# Altium PCB PCI Express Mini L1_V2.PCBDOC (part 1 of 9)
Units mm, origin at the board's own origin, x right, y up, seen from the top; angles counter-clockwise.
Board outline 70 x 83.2 mm, 6 copper layers (TopLayer, Layer 1, Layer 2, Layer 3, Layer 4, Bottom Layer), stack 0.893 mm thick; 442 components, 259 nets, 1412 pads, 870 vias.
Unrouted connection lines stored in the file: 2.
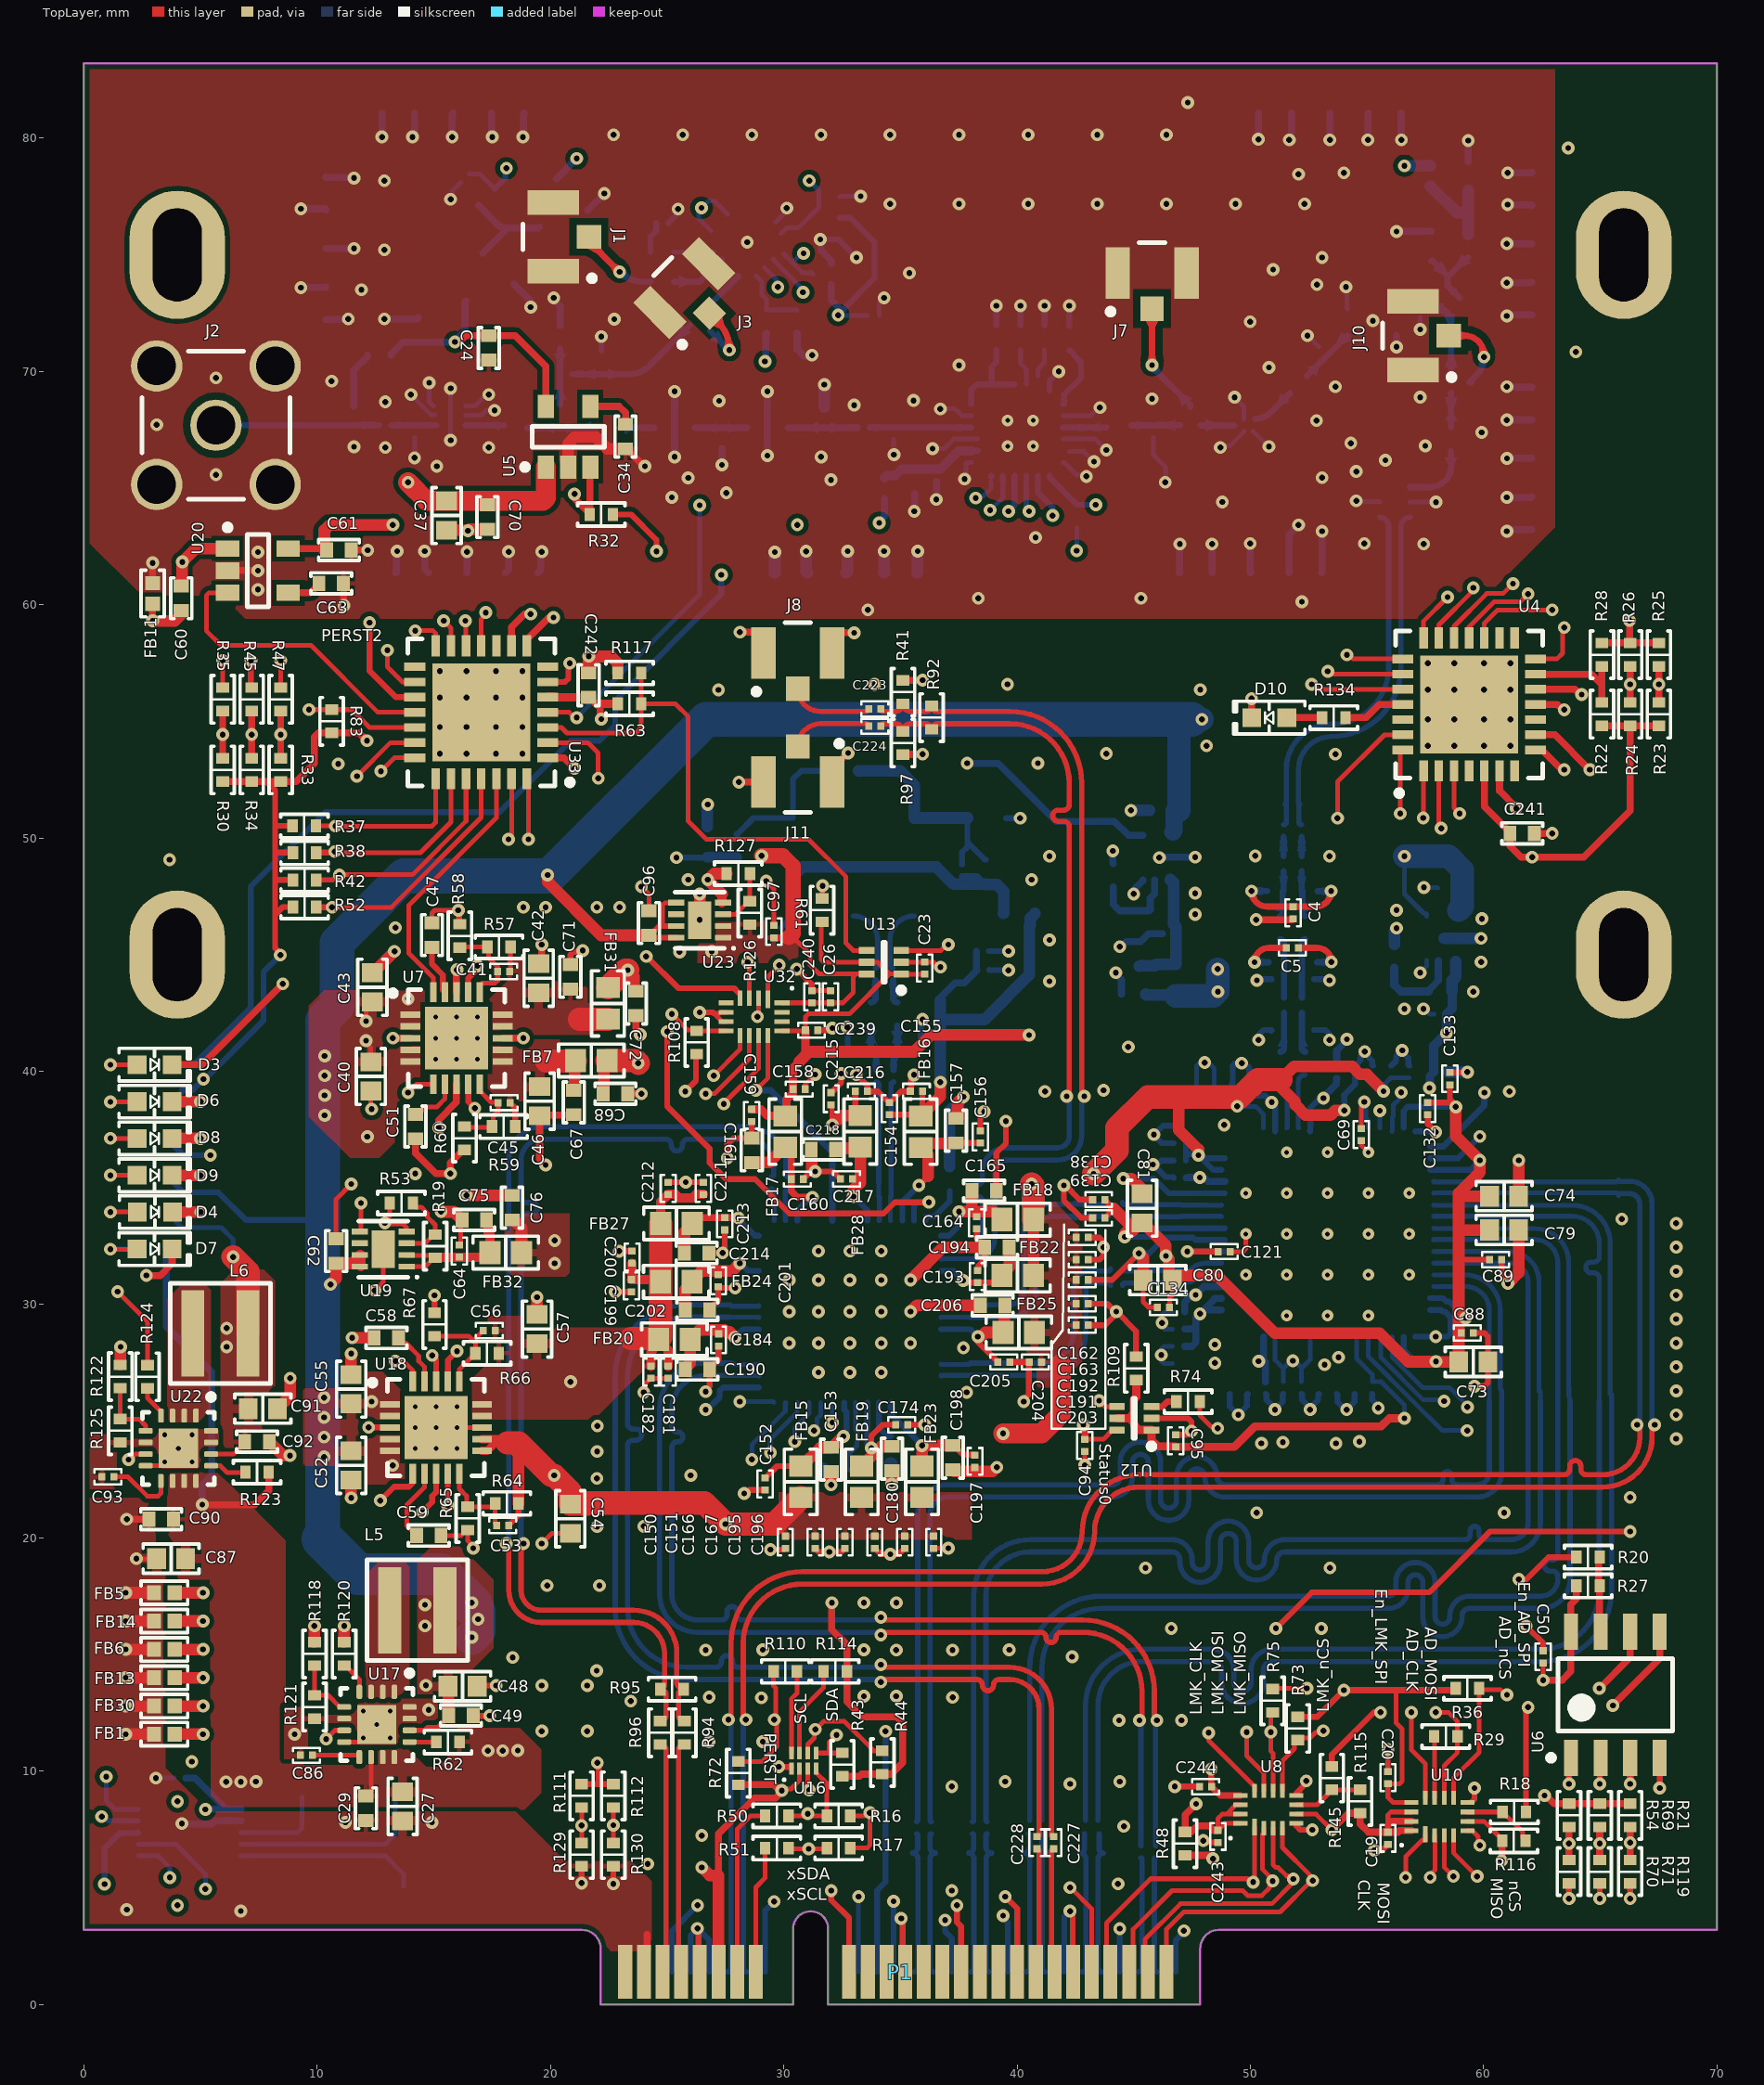
[diagram p0: TopLayer view]
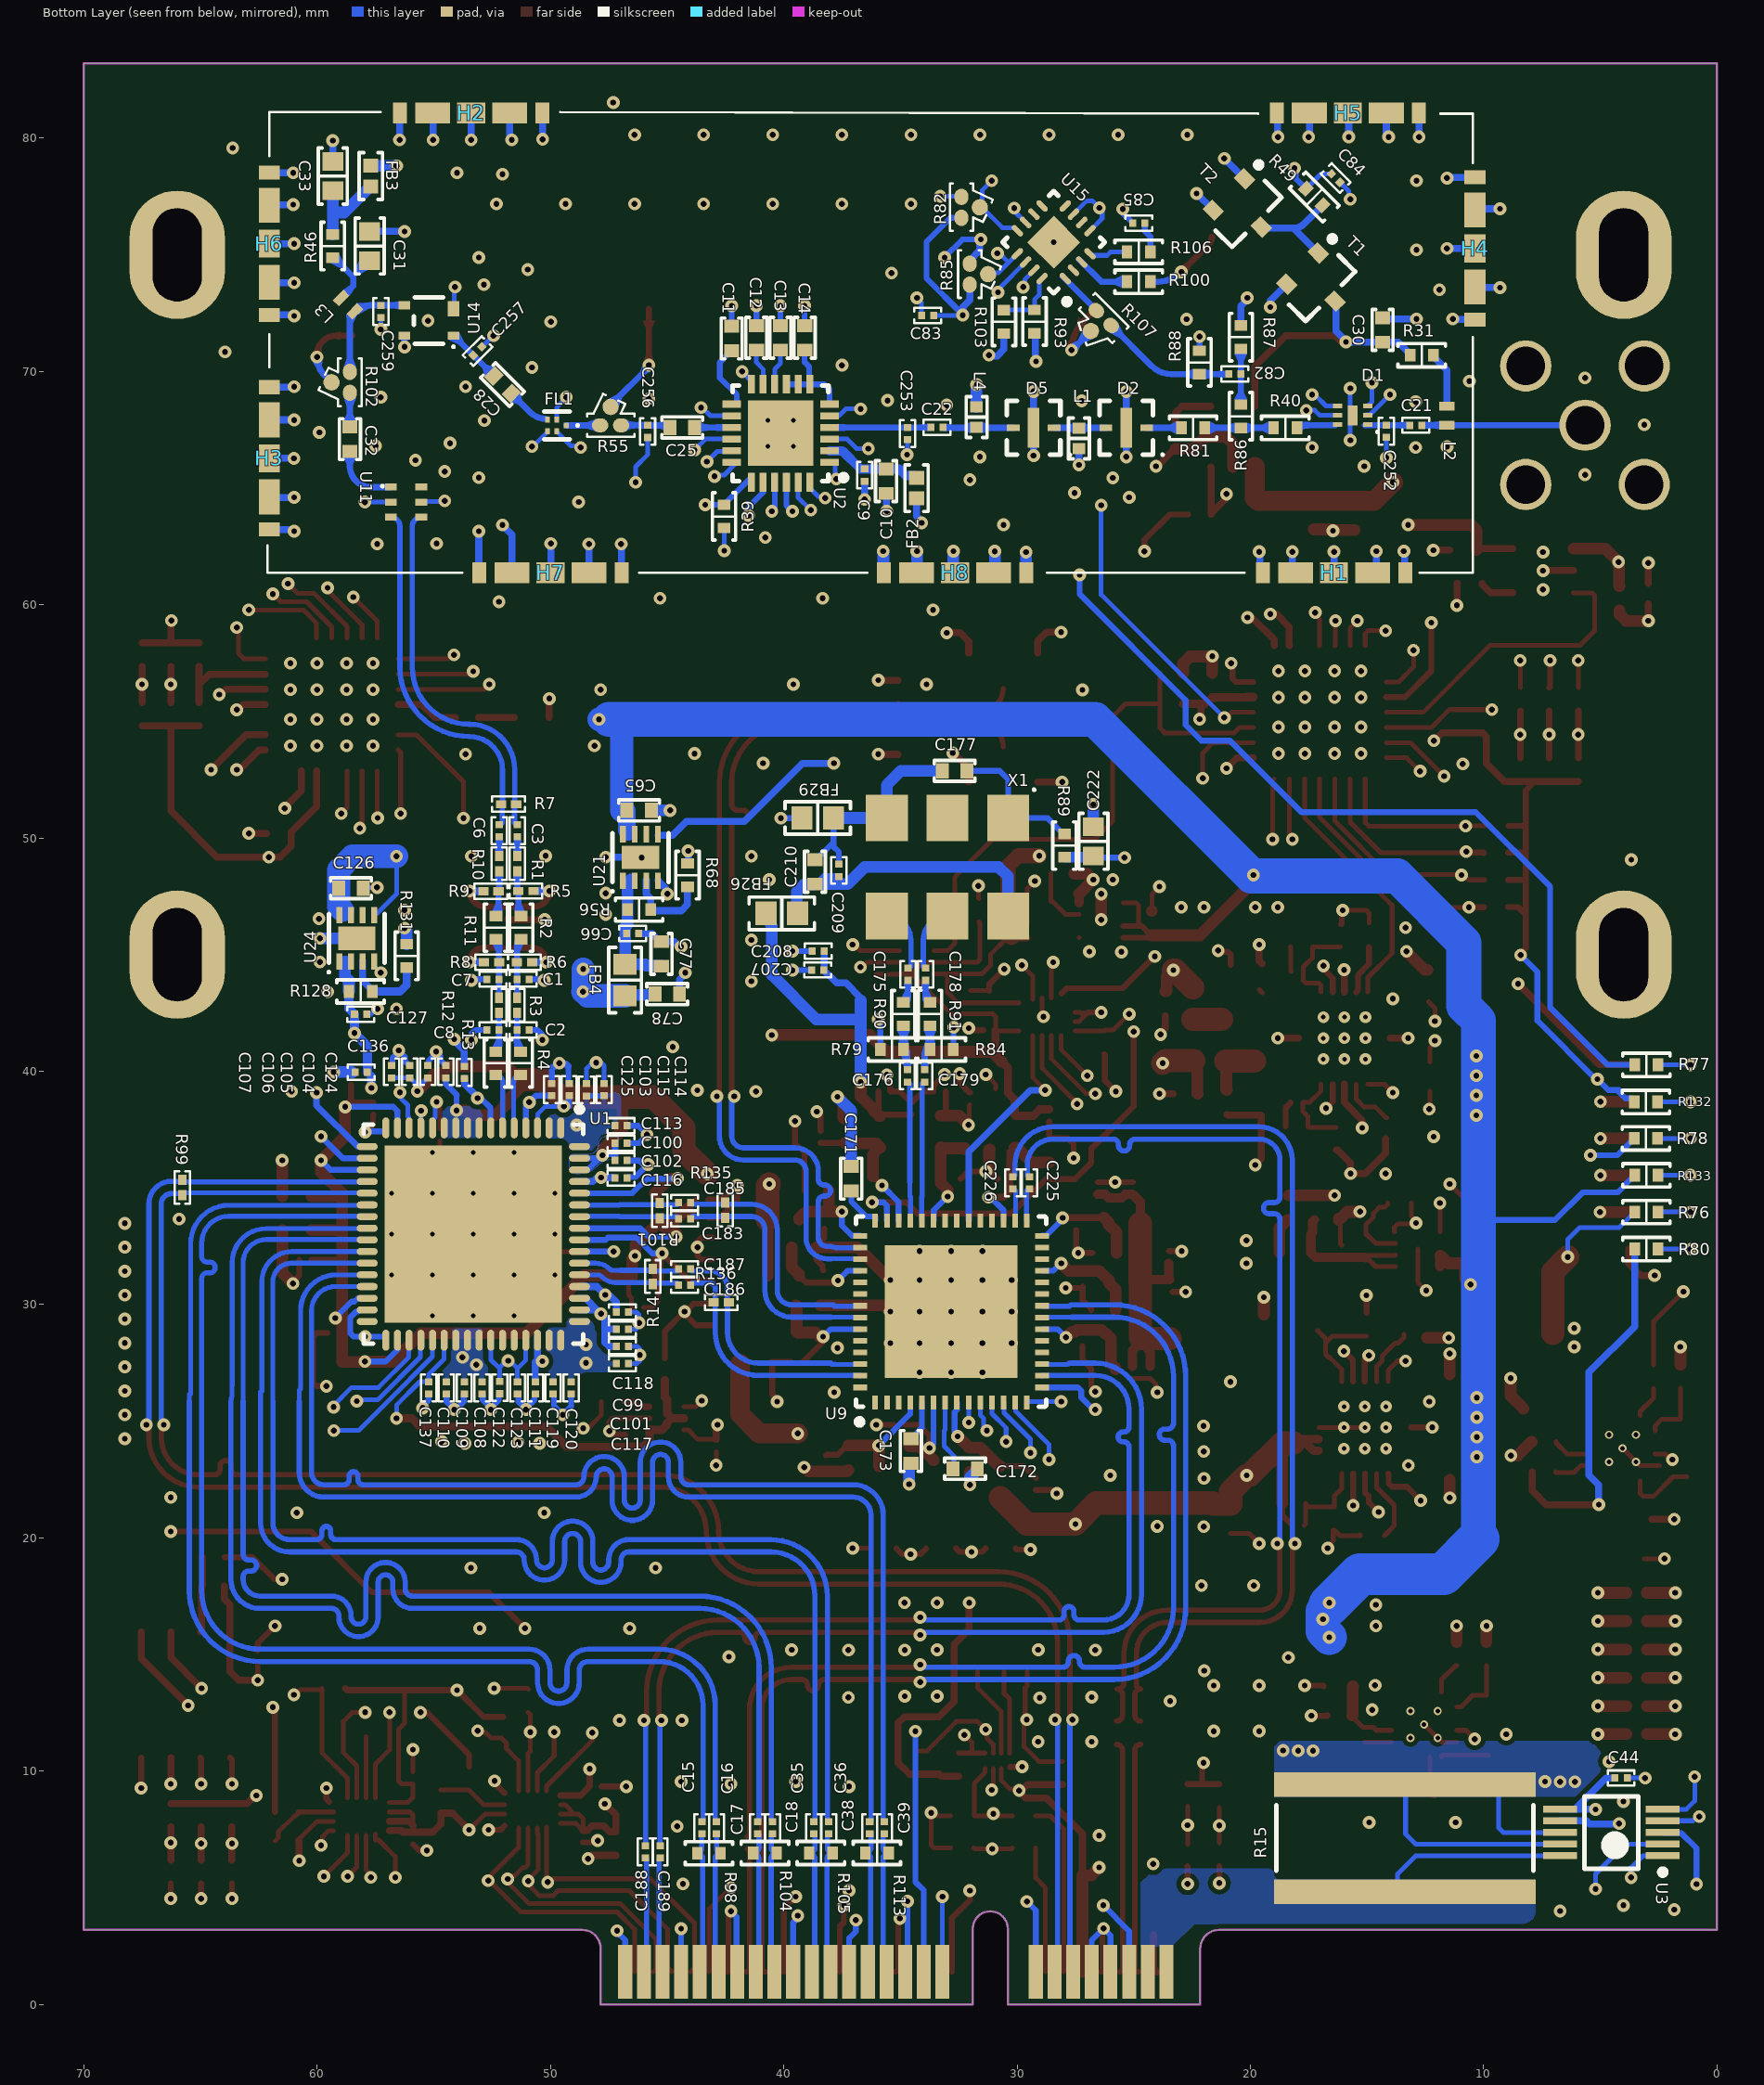
[diagram p1: Bottom Layer view, seen from below]
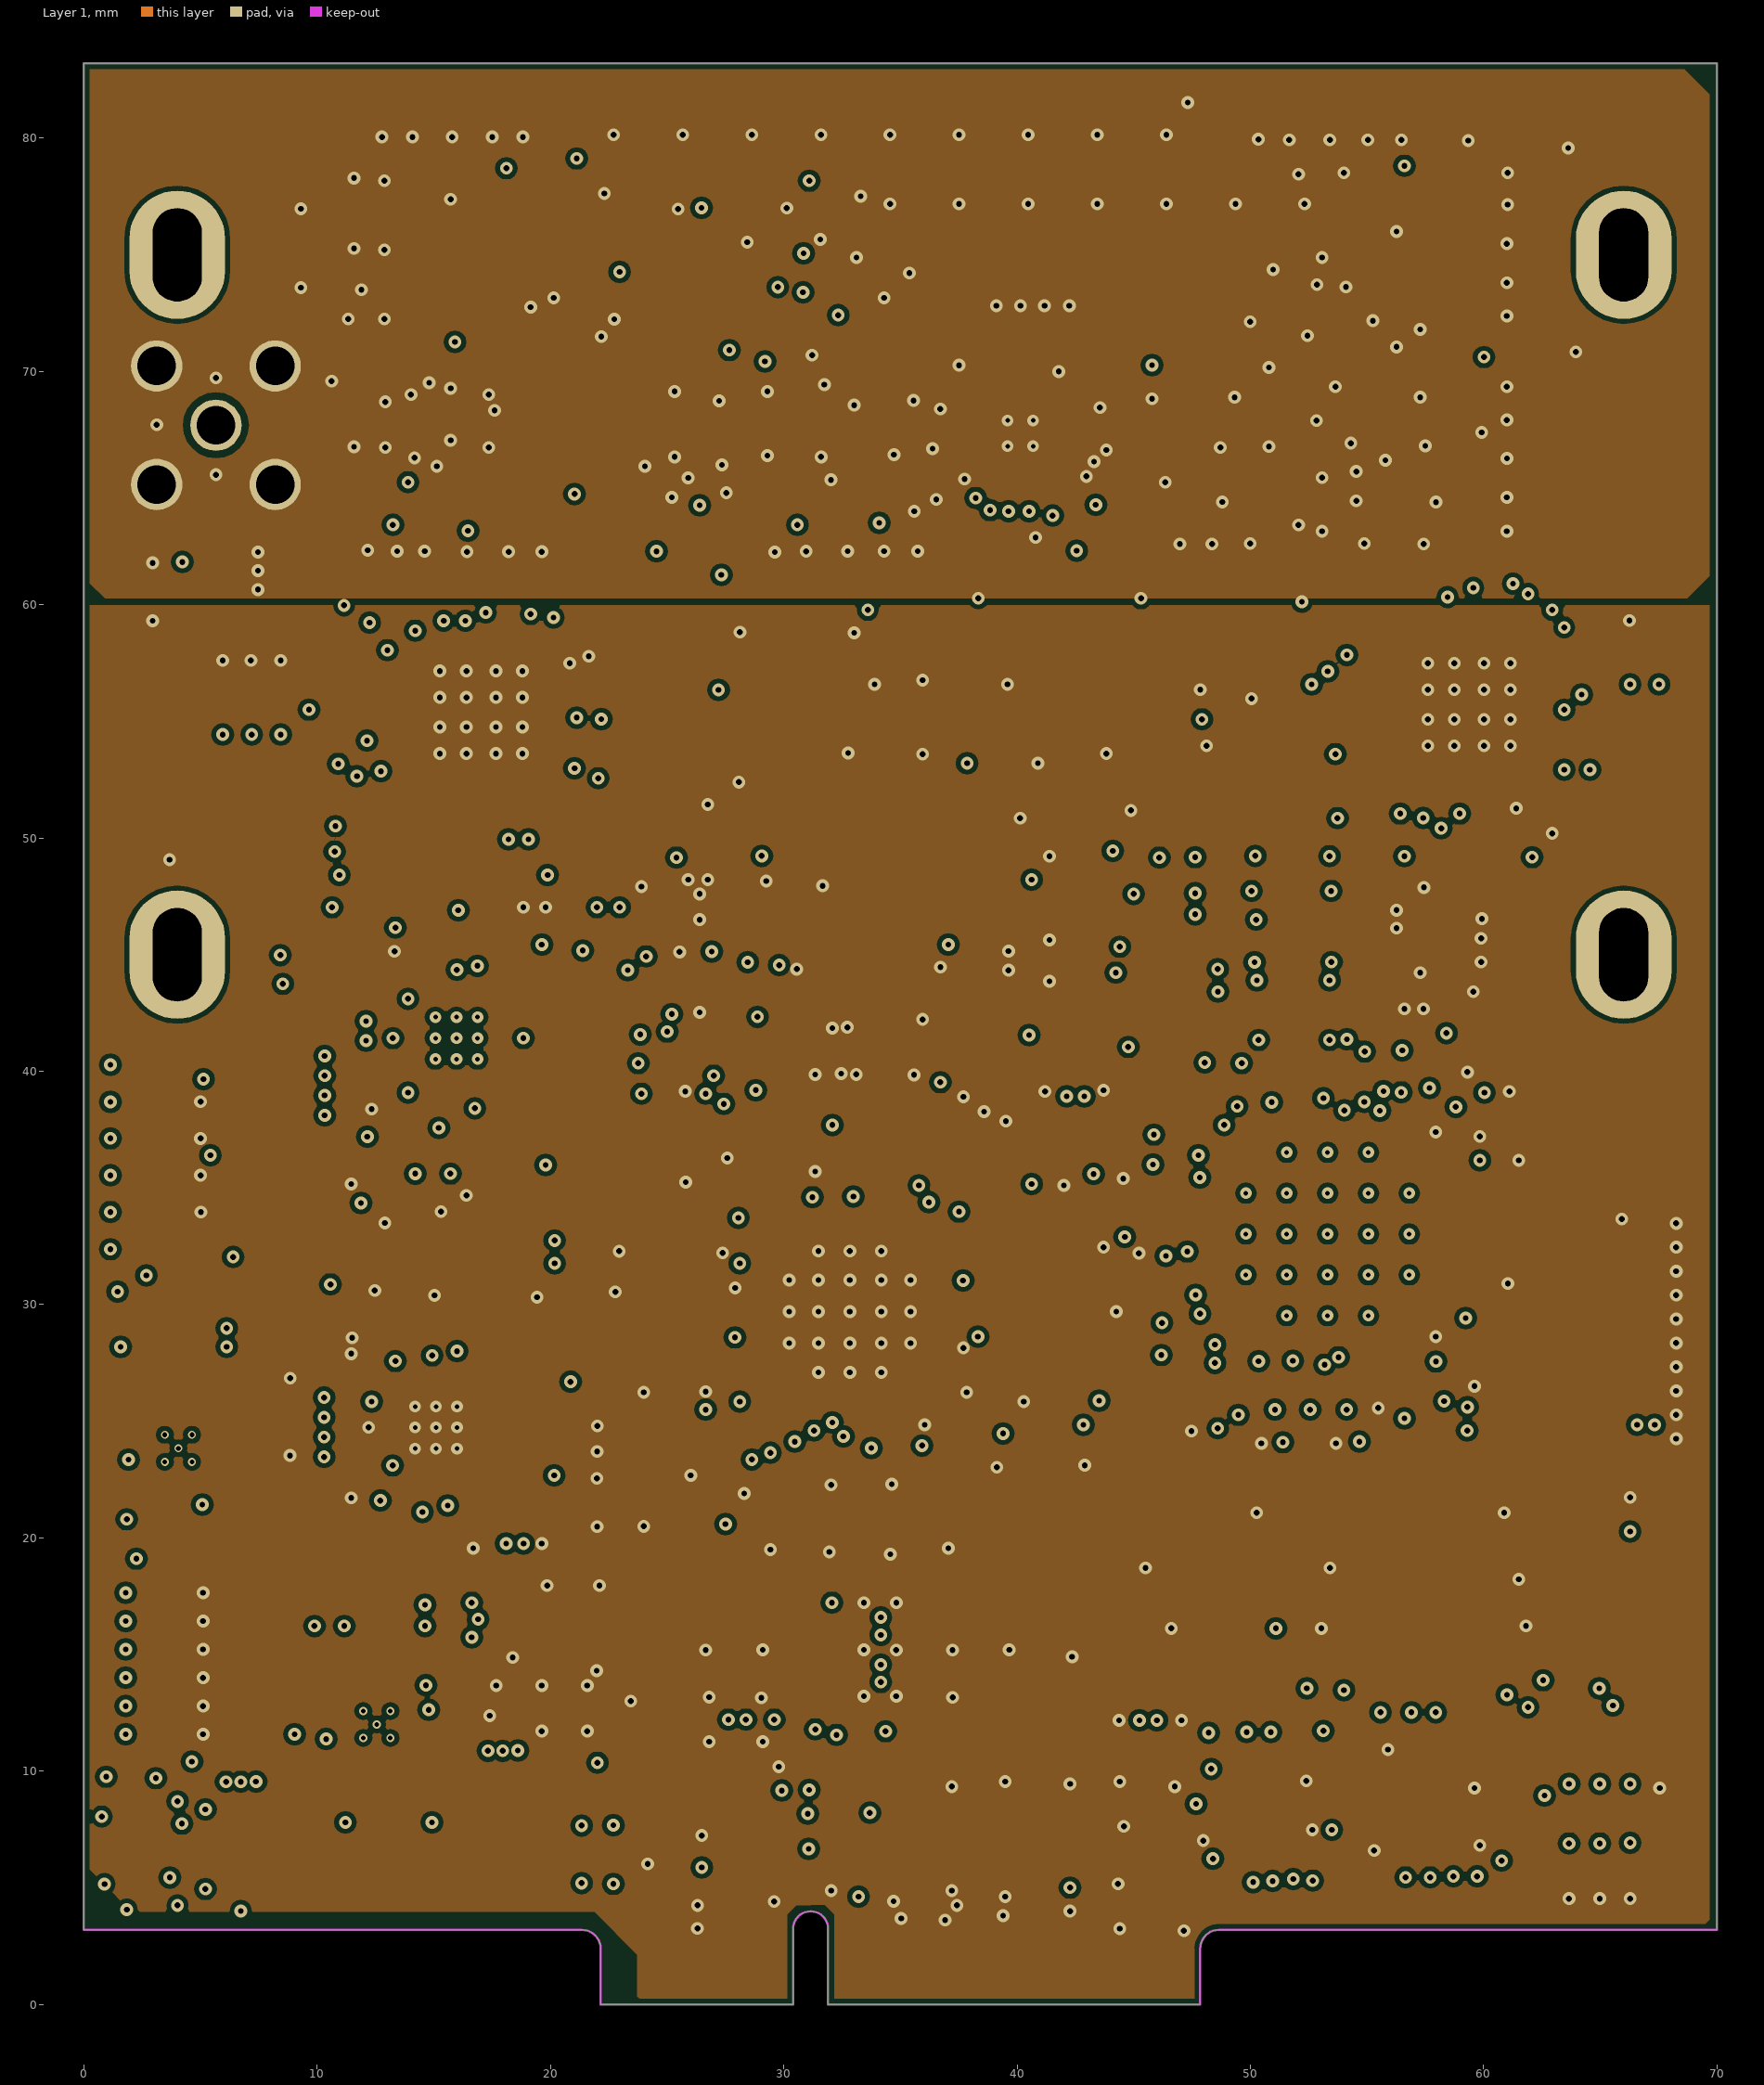
[diagram p2: Layer 1]
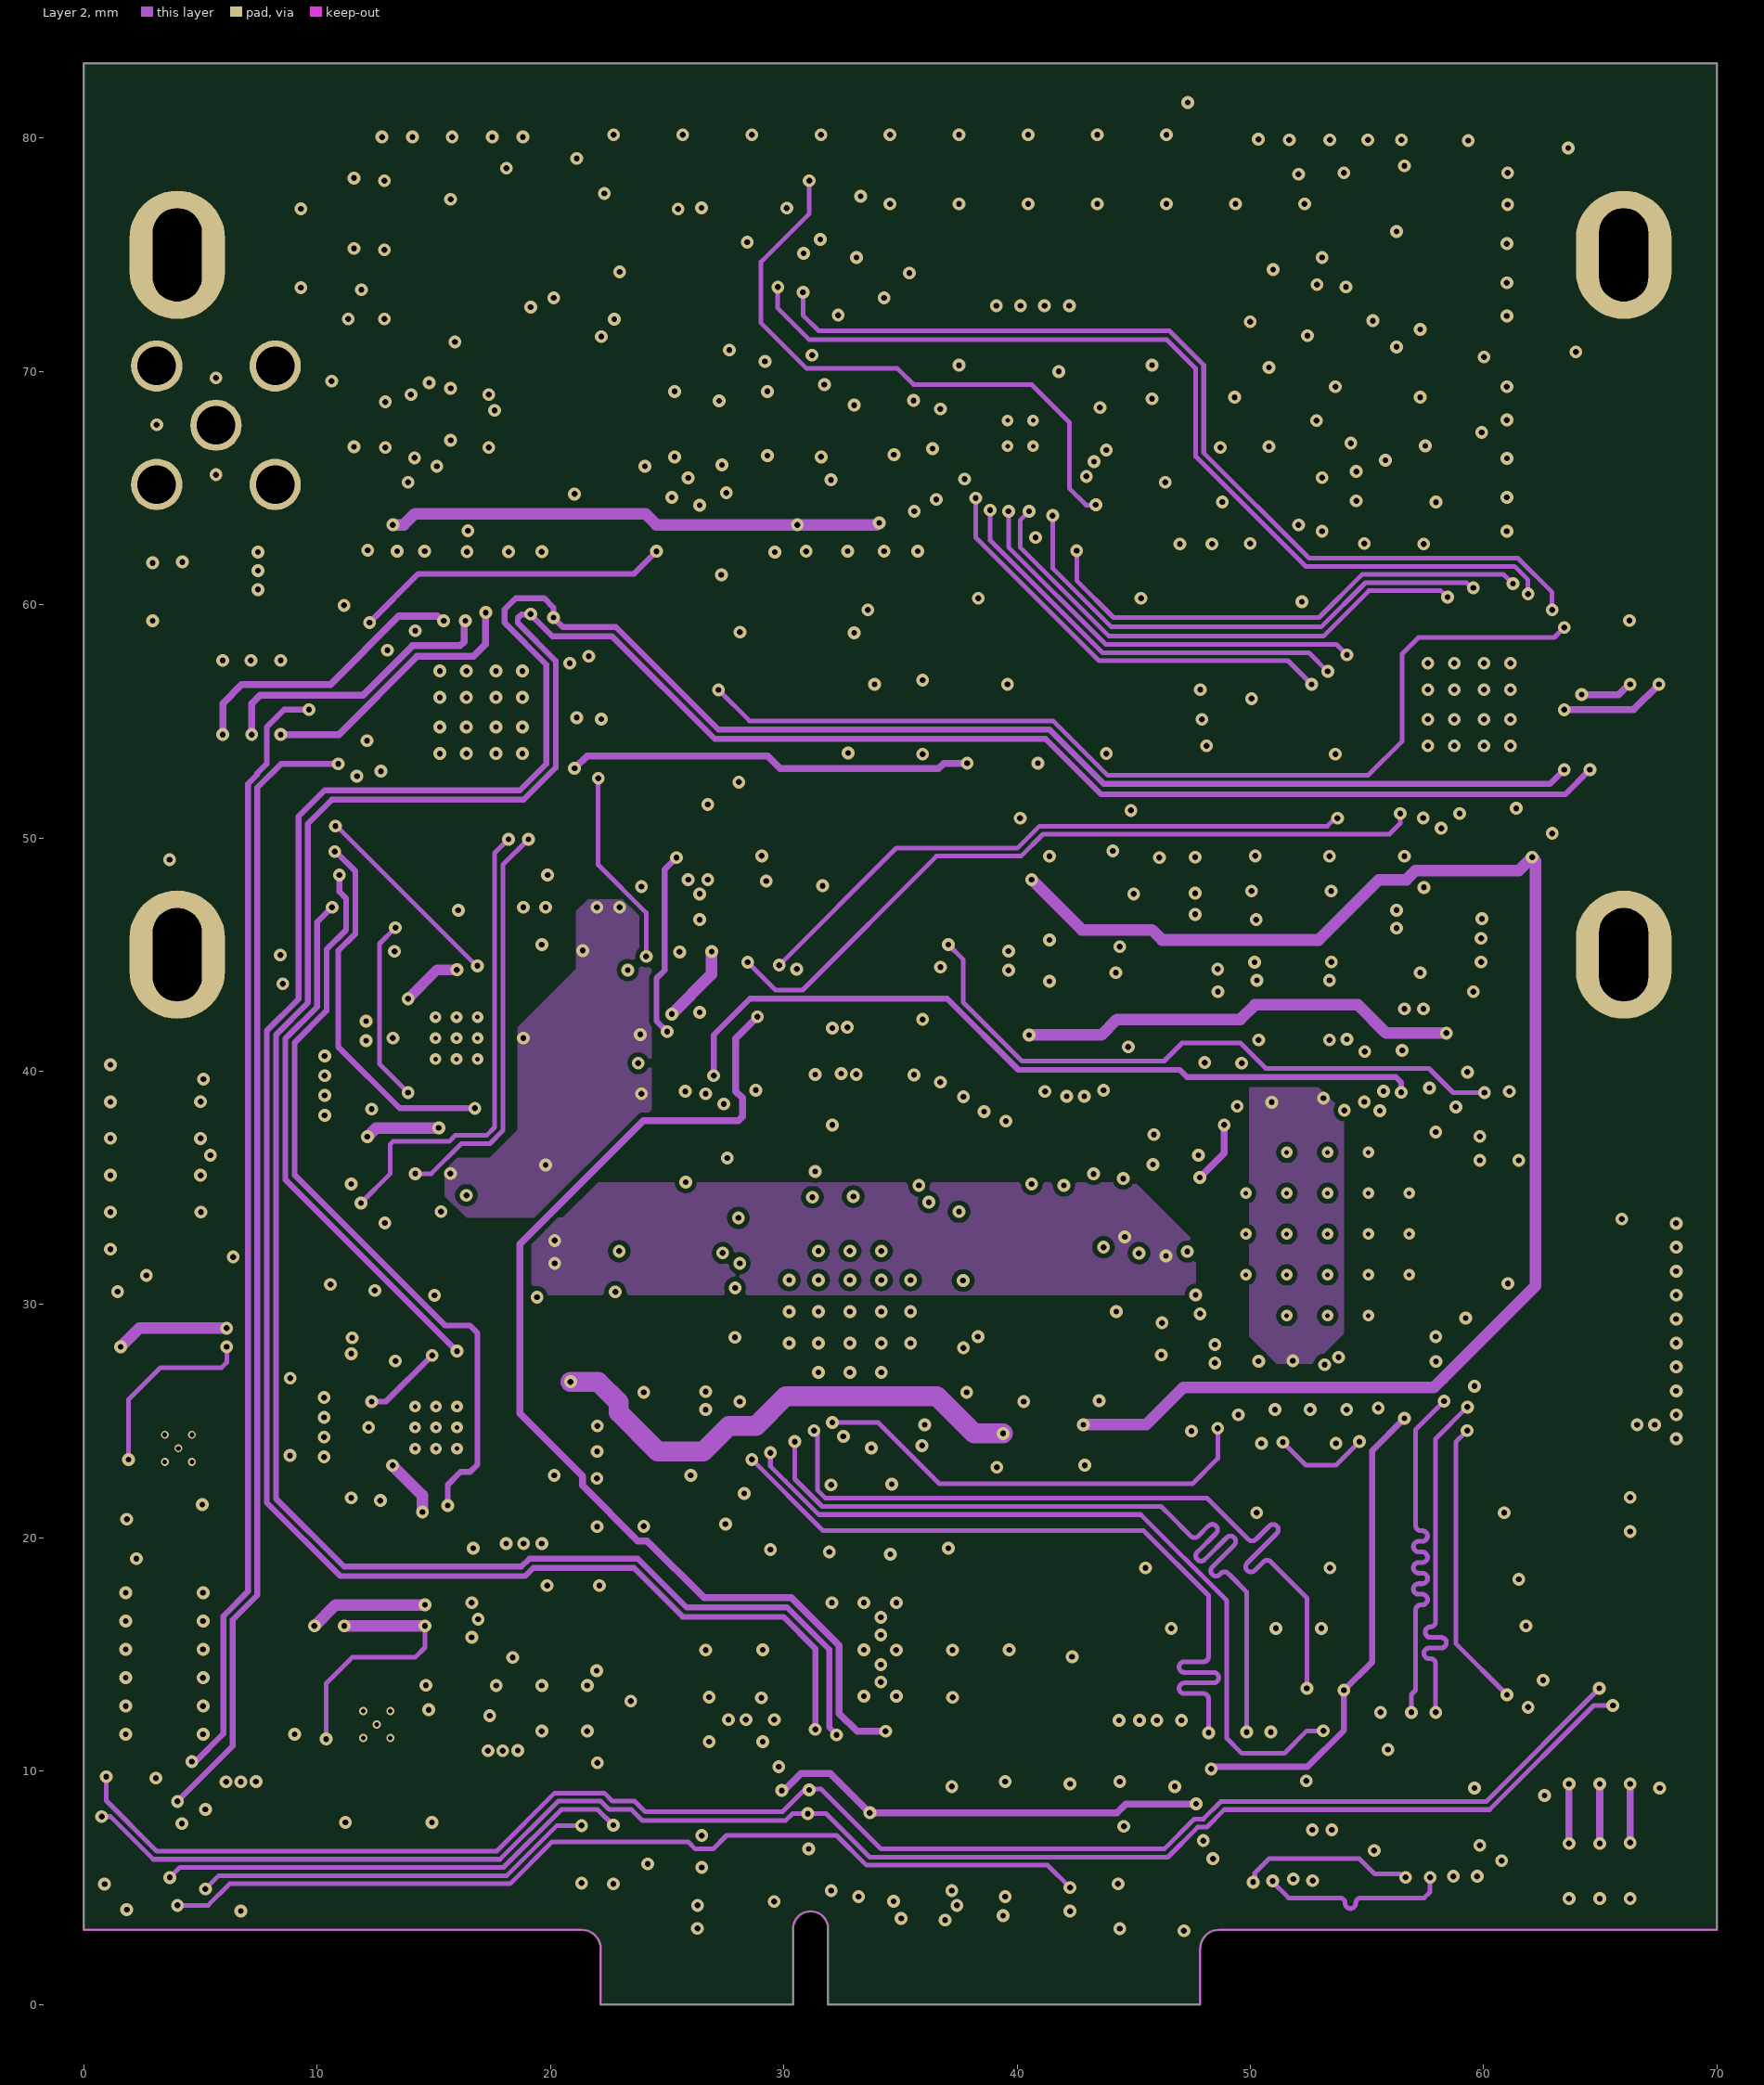
[diagram p3: Layer 2]
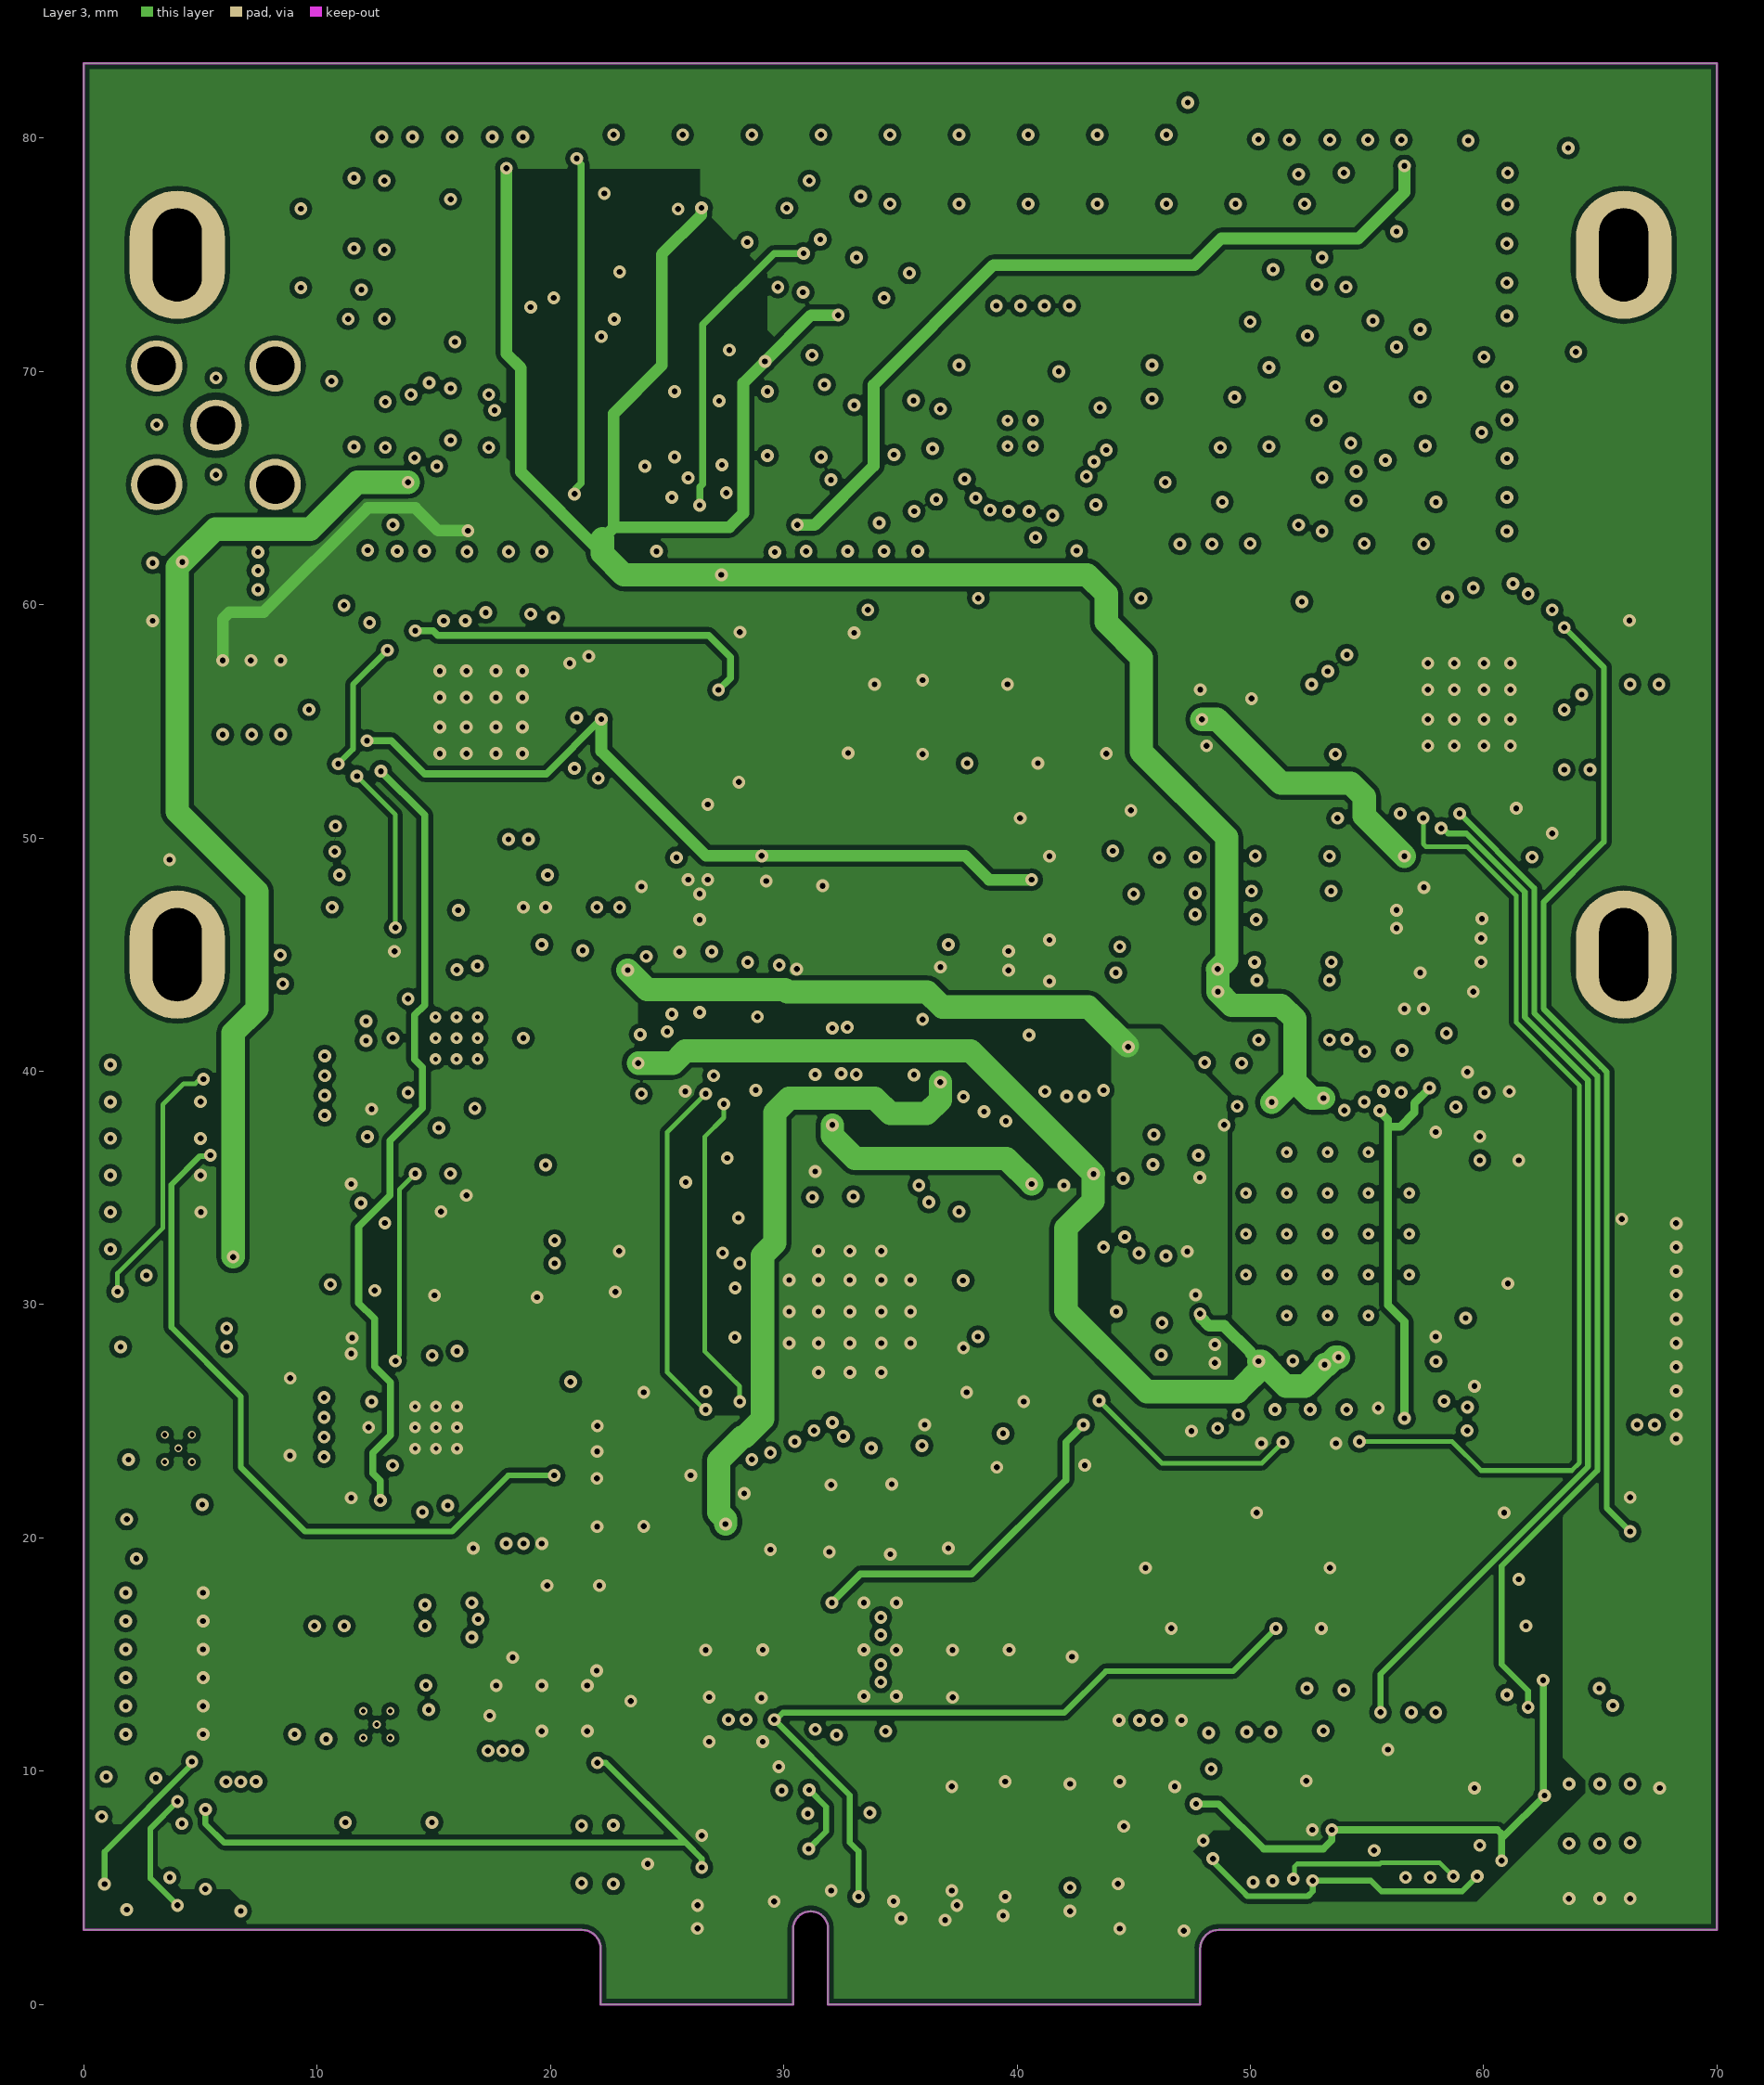
[diagram p4: Layer 3]
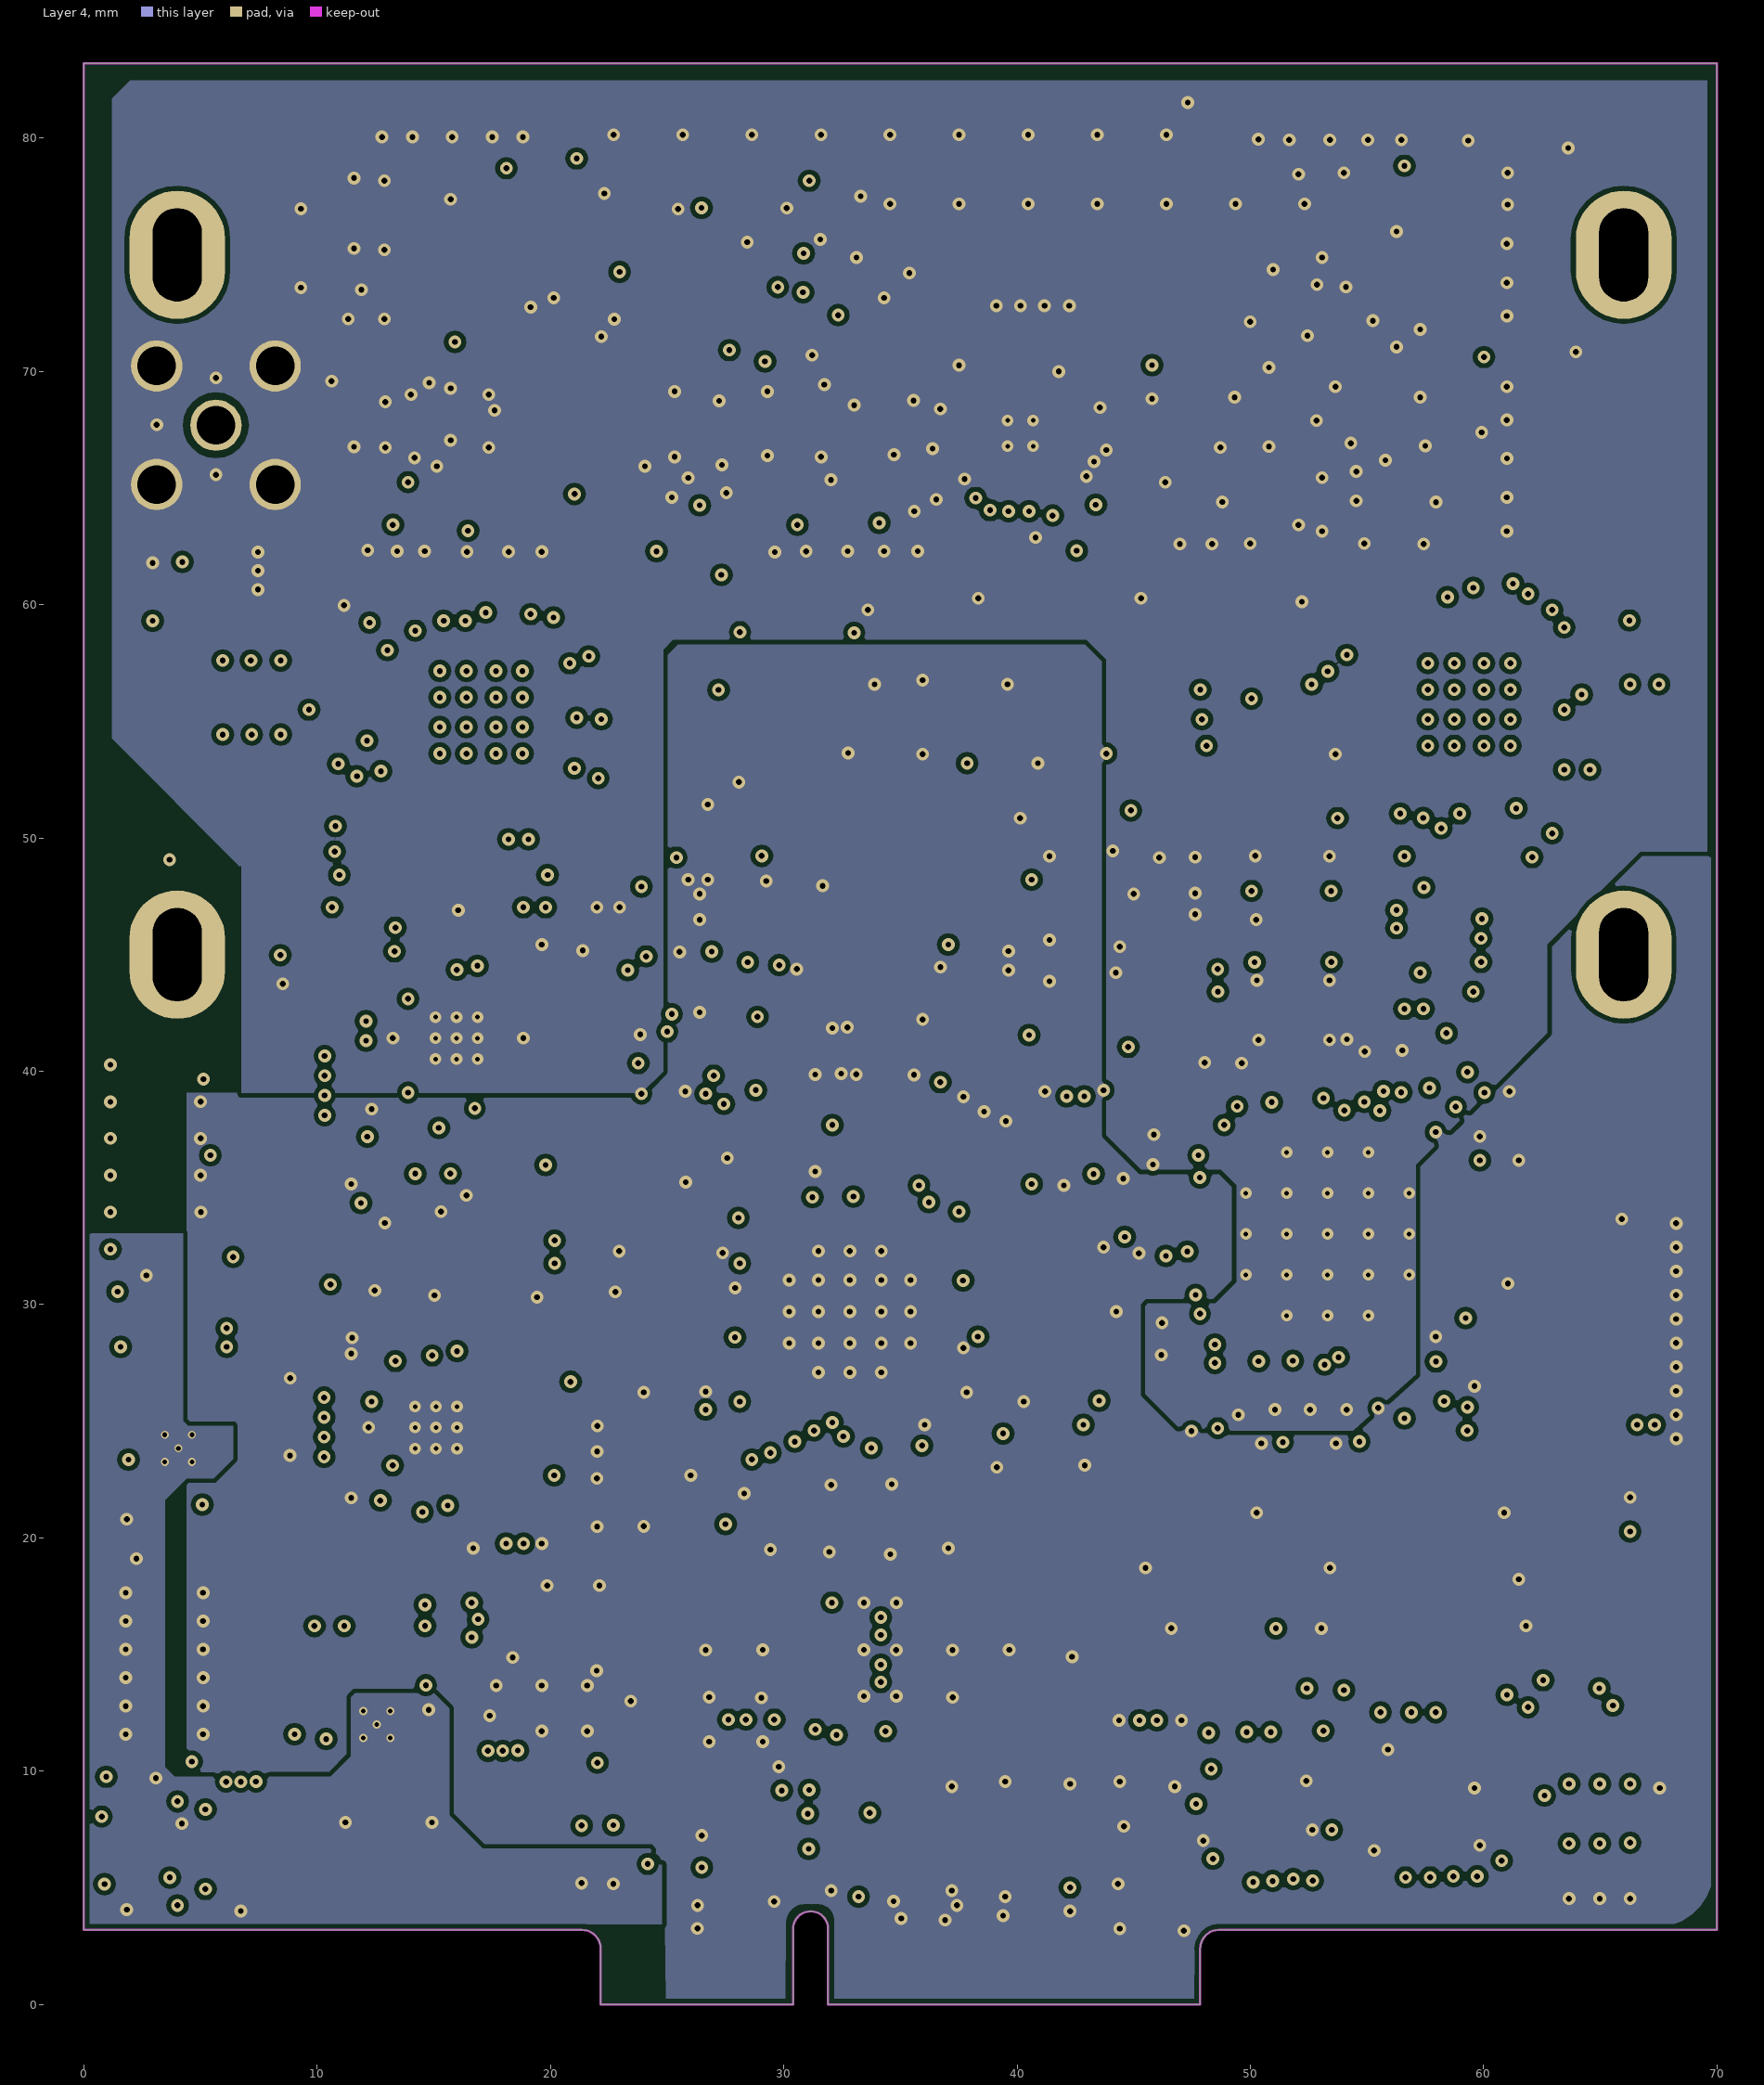
[diagram p5: Layer 4]

## Layer stack, top to bottom
TopSolder: solder mask 0.01, Solder Resist, Dk 3.5
TopLayer: signal copper 0.035
Dielectric1: prepreg 0.158, PP-018, Dk 4
Layer 1: signal copper 0.035
Dielectric 2: core 0.129, Core-016, Dk 3.96
Layer 2: signal copper 0.035
Dielectric2: prepreg 0.109, PP-018, Dk 4
Layer 3: signal copper 0.035
Dielectric 3: core 0.129, Core-016, Dk 3.96
Layer 4: signal copper 0.035
Dielectric 1: prepreg 0.158, PP-018, Dk 4
Bottom Layer: signal copper 0.035
Bottom Solder: solder mask 0.01, Solder Resist, Dk 3.5

## Board outline
22.15,2.4 ccw(c21.35,2.4) 21.35,3.2 0,3.2 0,83.2 70,83.2 70,3.2 48.65,3.2 ccw(c48.65,2.4) 47.85,2.4 47.85,0 31.9,0 31.9,3.25 ccw(c31.15,3.25) 30.4,3.25 30.4,0 22.15,0

## Design rules (kind name [scope] priority, off if disabled: settings)
Clearance Clearance_VIA [IsVia] p1: gap=0.2 ignorepadtopadclearanceinfootprint=TRUE
Clearance Clearance_Diff [InAnyDifferentialPair and not WithinRoom('Component keep out area bottom') and not WithinRoom('Component keep out area top')] p2: gap=0.5 ignorepadtopadclearanceinfootprint=TRUE except(0.2: Arc-SMDPad; 0.23: Arc-Arc Arc-Track Arc-Via Track-Track Track-SMDPad Track-Via SMDPad-SMDPad SMDPad-Via THPad-Via Via-Via)
Clearance Clearance_50 [InNetClass('Single50')] p3: gap=0.3 ignorepadtopadclearanceinfootprint=TRUE except(0.15: Arc-SMDPad Track-SMDPad Track-Region SMDPad-SMDPad SMDPad-Region; 0.2: Arc-Track Track-Track; 0.25: Arc-Arc)
Clearance "Clearance_Edge Connector" [(InComponentClass('Edge Connector')) vs (InComponentClass('Edge Connector'))] p4: gap=0.2 ignorepadtopadclearanceinfootprint=TRUE except(0: Arc-Hole Track-Hole SMDPad-Hole THPad-Hole Via-Hole Fill-Hole Poly-Hole Region-Hole Text-Hole)
Clearance [All] p5: gap=0.2 ignorepadtopadclearanceinfootprint=TRUE except(0.15: Arc-Arc Arc-Track Arc-SMDPad Track-Track Track-SMDPad SMDPad-SMDPad)
DiffPairsRouting Diff_100_0406 [InDifferentialPairClass('Diff_100') and WithinRoom('ROOM_AD')] p1: maxlimit=0.26 minlimit=0.2 mostfreqgap=0.26 toplayer_minwidth=0.21 toplayer_maxwidth=0.21 toplayer_prefwidth=0.21 midlayer1_minwidth=0.21 midlayer1_maxwidth=0.21 midlayer1_prefwidth=0.21 midlayer2_minwidth=0.21 midlayer2_maxwidth=0.21 midlayer2_prefwidth=0.21 midlayer3_minwidth=0.21 midlayer3_maxwidth=0.21 midlayer3_prefwidth=0.21 midlayer4_minwidth=0.21 midlayer4_maxwidth=0.21 midlayer4_prefwidth=0.21 bottomlayer_minwidth=0.21 bottomlayer_maxwidth=0.21 bottomlayer_prefwidth=0.21 maxuncoupledlength=12.7
DiffPairsRouting Diff_100 [InDifferentialPairClass('Diff_100')   And  Not  WithinRoom('ROOM_AD')] p2: maxlimit=0.305 minlimit=0.305 mostfreqgap=0.305 toplayer_minwidth=0.223 toplayer_maxwidth=0.223 toplayer_prefwidth=0.223 midlayer1_minwidth=0.223 midlayer1_maxwidth=0.223 midlayer1_prefwidth=0.223 midlayer2_minwidth=0.223 midlayer2_maxwidth=0.223 midlayer2_prefwidth=0.223 midlayer3_minwidth=0.223 midlayer3_maxwidth=0.223 midlayer3_prefwidth=0.223 midlayer4_minwidth=0.223 midlayer4_maxwidth=0.223 midlayer4_prefwidth=0.223 bottomlayer_minwidth=0.223 bottomlayer_maxwidth=0.223 bottomlayer_prefwidth=0.223 maxuncoupledlength=12.7
DiffPairsRouting Diff_100_0406_2 [InDifferentialPairClass('Diff_100') and WithinRoom('ROOM_0406_2')] p3 off: maxlimit=0.527 minlimit=0.24 mostfreqgap=0.254 toplayer_mingap=0.26 toplayer_maxgap=0.26 toplayer_prefgap=0.26 toplayer_minwidth=0.21 toplayer_maxwidth=0.21 toplayer_prefwidth=0.21 bottomlayer_mingap=0.26 bottomlayer_maxgap=0.26 bottomlayer_prefgap=0.26 bottomlayer_minwidth=0.21 bottomlayer_maxwidth=0.21 bottomlayer_prefwidth=0.21 impedanceprofiledriven=TRUE impedanceprofileid={E447CCB2-F64F-46AA-A652-460A0891FB1B} impedanceprofilevalue=100.000000 maxuncoupledlength=12.7
FabricationTestPointUsage TestPointUsage [All] p1: valid=0 allowmultiple=FALSE
FabricationTestpoint Testpoint [All] p1: side=3 testpointundercomponent=TRUE minsize=1.016 maxsize=2.54 preferedsize=1.524 minholesize=0.508 maxholesize=1.016 preferedholesize=0.813 testpointgrid=0.025 allowsidetop=TRUE allowsidebottom=TRUE usegrid=TRUE gridtolerance=0
Height "PCI Express Mini, \"Component height constraints\", Page 18, bottom side" [OnBottomLayer] p1: minheight=0 maxheight=2 prefheight=2
HoleSize [All] p1: absolutevalues=TRUE maxlimit=10 minlimit=0.25 maxpercent=80.000 minpercent=20.000
MatchedLengths MatchLengths_xSignals_U10_U1_1 [InxSignalClass('xSignals_U10_U1_MatchLengthsClass')] p1: tolerance=0.4 checknetsindiffpair=FALSE checkdiffpairvsdiffpair=TRUE checkxsignals=TRUE checkothers=TRUE
MatchedLengths MatchLengths_U8_Passives_U9 [InxSignalClass('xSignals_U8_Passives_U9_MatchLengthsClass')] p2: tolerance=0.4 checknetsindiffpair=FALSE checkdiffpairvsdiffpair=TRUE checkxsignals=TRUE checkothers=TRUE
MatchedLengths MatchLengths_xSignals_U8_Passives [InxSignalClass('xSignals_U8_Passives_MatchLengthsClass')] p3: tolerance=0.4 checknetsindiffpair=FALSE checkdiffpairvsdiffpair=TRUE checkxsignals=TRUE checkothers=TRUE
MatchedLengths MatchLengths_xSignals_U8_U9 [InxSignalClass('xSignals_U8_U9_MatchLengthsClass')] p4: tolerance=0.4 checknetsindiffpair=FALSE checkdiffpairvsdiffpair=TRUE checkxsignals=TRUE checkothers=TRUE
MatchedLengths MatchLengths_xSignals_U10_U1 [InxSignalClass('xSignals_U10_U1_MatchLengthsClass')] p5: tolerance=0.4 checknetsindiffpair=FALSE checkdiffpairvsdiffpair=TRUE checkxsignals=TRUE checkothers=TRUE
MatchedLengths MatchLengths_xSignals_P1_U10 [InxSignalClass('xSignals_P1_U10_MatchLengthsClass')] p6: tolerance=0.4 checknetsindiffpair=FALSE checkdiffpairvsdiffpair=TRUE checkxsignals=TRUE checkothers=TRUE
MatchedLengths MatchLengths_xSignals_P1_U8 [InxSignalClass('xSignals_P1_U8_MatchLengthsClass')] p7: tolerance=0.4 checknetsindiffpair=FALSE checkdiffpairvsdiffpair=TRUE checkxsignals=TRUE checkothers=TRUE
MatchedLengths MatchedLengthsAllDiff [InDifferentialPairClass('All Differential Pairs')] p8: tolerance=0.3 checknetsindiffpair=TRUE checkdiffpairvsdiffpair=FALSE checkxsignals=FALSE checkothers=FALSE
MatchedLengths MatchedLengthsCML-Cap_1 [InNetClass('CML_CAP_TO_CON')] p9: tolerance=0.3 checknetsindiffpair=FALSE checkdiffpairvsdiffpair=TRUE checkxsignals=TRUE checkothers=TRUE
MatchedLengths MatchedLengths_CLK_res_Adc [InNetClass('ADC_CLK')] p10: tolerance=0.2 checknetsindiffpair=FALSE checkdiffpairvsdiffpair=TRUE checkxsignals=TRUE checkothers=TRUE
MatchedLengths MatchedLengths_CLK_res_Adc_1 [InNetClass('Len_CLK_ADC')] p11: tolerance=0.2 checknetsindiffpair=FALSE checkdiffpairvsdiffpair=TRUE checkxsignals=TRUE checkothers=TRUE
MatchedLengths MATCH_CML_TO_CAP [InNetClass('Dlugosc')] p12: tolerance=1.2 checknetsindiffpair=FALSE checkdiffpairvsdiffpair=TRUE checkxsignals=TRUE checkothers=TRUE
MatchedLengths Match_FPGA_CLK [InNetClass('FPGA_CLK')] p13: tolerance=1 checknetsindiffpair=FALSE checkdiffpairvsdiffpair=TRUE checkxsignals=TRUE checkothers=TRUE
MatchedLengths Match_FPGA_CLK_1 [InNetClass('FPGA_CLK_1')] p14: tolerance=1 checknetsindiffpair=FALSE checkdiffpairvsdiffpair=TRUE checkxsignals=TRUE checkothers=TRUE
MinimumSolderMaskSliver [All] p1: minsoldermaskwidth=0.07
NetAntennae [All] p1: netantennaetolerance=0.2
PlaneClearance [All] p1: clearance=0.5
PlaneConnect [All] p1: planeconnectstyle=Direct reliefexpansion=0.508 reliefentries=4 reliefconductorwidth=0.254 reliefairgap=0.254
PolygonConnect "Connect Res0201" [HasFootprint('RES 0201/0603')] p1: thpad.connectstyle=Direct thpad.reliefconductorwidth=0.254 thpad.reliefentries=4 thpad.polygonreliefangle="90 Angle" thpad.airgapwidth=0.254 smdpad.connectstyle=Relief smdpad.reliefconductorwidth=0.2 smdpad.reliefentries=4 smdpad.polygonreliefangle="90 Angle" smdpad.airgapwidth=0.2 via.connectstyle=Direct via.reliefconductorwidth=0.254 via.reliefentries=4 via.polygonreliefangle="90 Angle" via.airgapwidth=0.254
PolygonConnect "Connect CAP0201" [HasFootprint('CAP 0201/0603 KK')] p2: thpad.connectstyle=Direct thpad.reliefconductorwidth=0.254 thpad.reliefentries=4 thpad.polygonreliefangle="90 Angle" thpad.airgapwidth=0.254 smdpad.connectstyle=Relief smdpad.reliefconductorwidth=0.2 smdpad.reliefentries=4 smdpad.polygonreliefangle="90 Angle" smdpad.airgapwidth=0.2 via.connectstyle=Direct via.reliefconductorwidth=0.254 via.reliefentries=4 via.polygonreliefangle="90 Angle" via.airgapwidth=0.254
PolygonConnect "Connect CAP0402" [HasFootprint('CAP 0402/1005 RF KK') or HasFootprint('CAP 0402/1005 KK')] p3: thpad.connectstyle=Direct thpad.reliefconductorwidth=0.254 thpad.reliefentries=4 thpad.polygonreliefangle="90 Angle" thpad.airgapwidth=0.254 smdpad.connectstyle=Relief smdpad.reliefconductorwidth=0.2 smdpad.reliefentries=4 smdpad.polygonreliefangle="90 Angle" smdpad.airgapwidth=0.2 via.connectstyle=Direct via.reliefconductorwidth=0.254 via.reliefentries=4 via.polygonreliefangle="90 Angle" via.airgapwidth=0.254
PolygonConnect "Connect CAP080" [HasFootprint('CAP 0805/2012 RF')] p4: thpad.connectstyle=Direct thpad.reliefconductorwidth=0.254 thpad.reliefentries=4 thpad.polygonreliefangle="90 Angle" thpad.airgapwidth=0.254 smdpad.connectstyle=Relief smdpad.reliefconductorwidth=0.55 smdpad.reliefentries=4 smdpad.polygonreliefangle="90 Angle" smdpad.airgapwidth=0.3 via.connectstyle=Direct via.reliefconductorwidth=0.254 via.reliefentries=4 via.polygonreliefangle="90 Angle" via.airgapwidth=0.254
PolygonConnect "Connect CAP0603" [HasFootprint('CAP 0603/1608 RF') or HasFootprint('CAP 0603/1608')] p5: thpad.connectstyle=Direct thpad.reliefconductorwidth=0.254 thpad.reliefentries=4 thpad.polygonreliefangle="90 Angle" thpad.airgapwidth=0.254 smdpad.connectstyle=Relief smdpad.reliefconductorwidth=0.4 smdpad.reliefentries=4 smdpad.polygonreliefangle="90 Angle" smdpad.airgapwidth=0.25 via.connectstyle=Direct via.reliefconductorwidth=0.254 via.reliefentries=4 via.polygonreliefangle="90 Angle" via.airgapwidth=0.254
PolygonConnect "Connect FB0603_1" [HasFootprint('FER 0603/1608') or HasFootprint('FER 0603/1608 KK')] p6: thpad.connectstyle=Direct thpad.reliefconductorwidth=0.254 thpad.reliefentries=4 thpad.polygonreliefangle="90 Angle" thpad.airgapwidth=0.254 smdpad.connectstyle=Relief smdpad.reliefconductorwidth=0.35 smdpad.reliefentries=4 smdpad.polygonreliefangle="90 Angle" smdpad.airgapwidth=0.2 via.connectstyle=Direct via.reliefconductorwidth=0.254 via.reliefentries=4 via.polygonreliefangle="90 Angle" via.airgapwidth=0.254
PolygonConnect "Connect Res0402" [HasFootprint('RES 0402/1005 RF KK') or HasFootprint('RES 0402/1005 KK')] p7: thpad.connectstyle=Direct thpad.reliefconductorwidth=0.254 thpad.reliefentries=4 thpad.polygonreliefangle="90 Angle" thpad.airgapwidth=0.254 smdpad.connectstyle=Relief smdpad.reliefconductorwidth=0.2 smdpad.reliefentries=4 smdpad.polygonreliefangle="90 Angle" smdpad.airgapwidth=0.2 via.connectstyle=Direct via.reliefconductorwidth=0.254 via.reliefentries=4 via.polygonreliefangle="90 Angle" via.airgapwidth=0.254
PolygonConnect "Connect Res06031" [HasFootprint('RES 0603/1608')] p8: thpad.connectstyle=Direct thpad.reliefconductorwidth=0.254 thpad.reliefentries=4 thpad.polygonreliefangle="90 Angle" thpad.airgapwidth=0.254 smdpad.connectstyle=Relief smdpad.reliefconductorwidth=0.4 smdpad.reliefentries=4 smdpad.polygonreliefangle="90 Angle" smdpad.airgapwidth=0.25 via.connectstyle=Direct via.reliefconductorwidth=0.254 via.reliefentries=4 via.polygonreliefangle="90 Angle" via.airgapwidth=0.254
PolygonConnect Power_Line1 [InNetClass('Power_Line')] p9: connectstyle=Direct reliefconductorwidth=0.254 reliefentries=4 polygonreliefangle="90 Angle" airgapwidth=0.254
PolygonConnect [All] p10: connectstyle=Direct reliefconductorwidth=0.254 reliefentries=4 polygonreliefangle="90 Angle" airgapwidth=0.254
ReturnPath [InNetClass('Diff_100')] p1 off: impedanceprofileid={4EC12C71-731A-4A04-9E39-5B54F8BA15AE} _gaplimit=1 _useantipads=TRUE
RoomDefinition ROOM_AD [False] p1: confinementstyle=ConfineIn formatcopy=TRUE lockcomponents=FALSE outline 47.006,25.857 65.775,25.857 65.775,40.213 47.006,40.213
RoomDefinition ROOM_0406_2 [False] p2: confinementstyle=ConfineIn formatcopy=TRUE lockcomponents=FALSE outline 27.659,23.53 37.996,23.53 37.996,35.262 27.659,35.262
RoomDefinition "Component keep out area bottom" [Not (InComponentClass('Edge Connector'))] p3: confinementstyle=ConfineOut formatcopy=TRUE lockcomponents=FALSE outline 20,5.1 50,5.1 50,3.138 48.65,3.138 48.321,3.064 48.092,2.915 47.915,2.666 47.85,2.354 47.85,0 22.15,0 22.15,2.354 22.083,2.69 21.956,2.89 21.626,3.089 21.35,3.138 20,3.138
RoomDefinition "Component keep out area top" [Not (InComponentClass('Edge Connector'))] p4: confinementstyle=ConfineOut formatcopy=TRUE lockcomponents=FALSE outline 21.35,3.2 21.4,3.25 30.2,3.25 30.2,4.2 32.1,4.2 32.1,3.25 32.15,3.2 48.45,3.2 ccw(c48.45,2.888) 48.229,3.109 48.016,2.896 ccw(c48.417,2.494) 47.85,2.494 47.85,0 22.15,0 22.15,2.513 ccw(c21.574,2.513) 21.981,2.921 21.814,3.088 ccw(c21.727,3.002) 21.727,3.124 ccw(c21.544,2.941) 21.544,3.2
RoutingVias [All] p1: holewidth=0.25 width=0.55 viastyle="Through Hole" minholewidth=0.25 minwidth=0.55 maxholewidth=0.25 maxwidth=0.55 useviatemplates=TRUE viatemplateguid#1={3A3E701C-EB47-4E11-930B-C72D353C3C4D} viatemplateguid#2={ACF0876F-D176-4AE6-A9DA-1391D5FAFA5C} viatemplatename#1=v50h20m0mx0 viatemplatename#2=v55h25m0mx0
SilkToSilkClearance [All] p1: silktosilkclearance=0.1
SilkToSolderMaskClearance SilkscreenOverComponentPads [IsPad] p1: minsilkscreentomaskgap=0.254 clearancetoexposedcopper=TRUE
SolderMaskExpansion [HasPad('J2-M2')] p1: expansion=0 istentingtop=FALSE
ViasUnderSMD [All] p1: allowed=FALSE
Width [InNetClass('Diff_100') and WithinRoom('ROOM_0406_2')] p1 off: maxlimit=0.21 minlimit=0.21 preferedwidth=0.21
Width Width_S_50 [InNetClass('Single50')] p2: maxlimit=0.281 minlimit=0.254 preferedwidth=0.254 toplayer_minwidth=0.268 toplayer_maxwidth=0.268 toplayer_prefwidth=0.268 bottomlayer_minwidth=0.268 bottomlayer_maxwidth=0.268 bottomlayer_prefwidth=0.268 impedanceprofiledriven=TRUE impedanceprofileid={40FFE645-052D-4050-9BA8-CD5BD897BE0C} impedanceprofilevalue=50.000000 minimp=50.000000 maximp=50.000000 favimp=50.000000
Width Width_POWER [InNetClass('Power_Line')] p3: maxlimit=3 minlimit=0.2 preferedwidth=0.5 toplayer_maxwidth=2 bottomlayer_maxwidth=2 minimp=50.000000 maximp=50.000000 favimp=50.000000
Width Width_simple [All] p4: maxlimit=1 minlimit=0.2 preferedwidth=0.3
19 further rules are at their usual default settings.

## Classes and differential pairs
net class SPI_MB: SPI_CLK_MB SPI_MISO_MB SPI_MOSI_MB SPI_nCS_1_MB
net class FPGA_CLK_1: CLKout1_N CLKout1_P CLKout3_N CLKout3_P
net class Len_CLK_ADC: ADC_CLK9690_N ADC_CLK9690_P adc_Sysref_N adc_Sysref_P
net class SPI_LMK: 04610_STATUS0 SPI__LMK_MOSI SPI_LMK_CLK SPI_LMK_CS SPI_LMK_MISO
net class SPI_AD: SPI_CLK_AD SPI_CS_AD SPI_MOSI_AD
component class U_LED_IND: D3 D4 D6 D7 D8 D9 R76 R77 R78 R80 R132 R133
net class CML_CAP_TO_CON: CMLout1_N CMLout1_P CMLout2_N CMLout2_P CMLout3_N CMLout3_P CMLout4_N CMLout4_P
net class SYNC: SYNC_N SYNC_P
net class CLK_IN_TO_CAP: CLKin1_N CLKin1_P
net class FPGA_CLK: O1_N O1_P O3_N O3_P
component class "U_Connector miniPCIe": P1
net class Dlugosc: CMLout1_ADC_N CMLout1_ADC_P CMLout2_ADC_N CMLout2_ADC_P CMLout3_ADC_N CMLout3_ADC_P CMLout4_ADC_N CMLout4_ADC_P
net class CLK_IN_LMK: LMK_CLKin1_N LMK_CLKin1_P
net class CLK_O: ADC_CLK9690_N ADC_CLK9690_P adc_Sysref_N adc_Sysref_P O1_N O1_P O3_N O3_P
component class U_Zegar: C171 C172 C173 C175 C176 C177 C178 C179 C183 C185 C186 C187 C188 C189 C222 C223 C224 C225 C226 C227 C228 J8 J11 R14 R41 R79 R84 R89 R90 R91 R92 R94 R95 R96 R97 R101 R135 R136 X1
component class U_Zasilanie: C27 C29 C40 C41 C42 C43 C45 C46 C47 C48 C49 C51 C52 C53 C54 C55 C56 C57 C58 C59 C60 C61 C62 C63 C64 C65 C66 C67 C68 C71 C72 C75 C76 C77 C78 C86 C87 C90 C91 C92 C93 C96 C97 C126 C127 FB1 FB4 FB5 FB6 FB7 FB11 FB13 FB14 FB30 FB31 FB32 L5 L6 R19 R37 R38 R42 R52 R53 R56 R57 R58 R59 R60 R62 R64 R65 R66 R67 R68 R118 R120 R121 R122 R123 R124 R125 R126 R127 R128 R131 U7 U17 U18 U19 U20 U21 U22 U23 U24
component class U_Zasilanie_LMK: C150 C151 C152 C153 C154 C155 C156 C157 C158 C159 C160 C161 C162 C163 C164 C165 C166 C167 C174 C180 C181 C182 C184 C190 C191 C192 C193 C194 C195 C196 C197 C198 C199 C200 C201 C202 C203 C204 C205 C206 C207 C208 C209 C210 C211 C212 C213 C214 C215 C216 C217 C218 FB15 FB16 FB17 FB18 FB19 FB20 FB22 FB23 FB24 FB25 FB26 FB27 FB28 FB29 U9
component class U_Zasilanie_ADC: C69 C73 C74 C79 C80 C81 C88 C89 C99 C100 C101 C102 C103 C104 C105 C106 C107 C108 C109 C110 C111 C113 C114 C115 C116 C117 C118 C119 C120 C121 C122 C123 C124 C125 C132 C133 C134 C136 C137 C138 C139 U1
component class U_Tor: FB2 FB3 U11
component class U_TorGnss: C25 C28 C31 C32 C33 C256 C257 C259 FL1 J7 J10 L3 R46 R55 R102 U14
component class "U_Tor antenowy": C21 C22 C24 C30 C34 C37 C70 C82 C83 C84 C85 C252 C253 D2 D5 J1 J2 J3 L1 L2 L4 R31 R32 R40 R49 R81 R82 R85 R86 R87 R88 R93 R100 R103 R106 R107 T1 T2 U5 U15
component class "U_Pomiar prądu i napięcia": C44 R15 R83 R111 R112 R129 R130 U3
component class U_Flash: C50 R20 R21 R27 R54 R69 R70 R71 R119 U6
component class U_ATT: C9 C10 C11 C12 C13 C14 R39 U2
component class U_ADC: C1 C2 C3 C4 C5 C6 C7 C8 C15 C16 C17 C18 C35 C36 C38 C39 R1 R2 R3 R4 R5 R6 R7 R8 R9 R10 R11 R12 R13 R98 R99 R104 R105 R113
component class Karta_Radiowa: H1 H2 H3 H4 H5 H6 H7 H8
differential pair class Diff_100: ADC_CLK9690 adc_Sysref Ain_2122_A AIn_2122_B Ain_2122A AIn_2122B AN_IN AN_IN_9690 CLKin0 CLKin0_1 CLKin0P CLKin1 CLKin1_1 CLKin1P CLKout1 CLKout1_C CLKout1_C2 CLKout2 CLKout2_C CLKout3 CLKout3_C CLKout4 CLKout4_C CLKout5 CLKout5_C CLKout5_C2 CLKout6 CLKout6O CLKout8 CLKout8_C CLKout9 CLKout9_C CLKout10 CLKout10_C CMLout1 CMLout1_ADC CMLout2 CMLout2_ADC CMLout3 CMLout3_ADC CMLout4 CMLout4_ADC CMLOUT_A CMLOUT_AC CMLOUT_B CMLOUT_BC LMK_CLKin0 LMK_CLKin1 LMK_OSC_IN O1 O1P O2 O3 O3P O4 O5 O5P O6 O6P O8 OSCIN PER3 SYNC VCXO_OUT
net class Single50: AN_IN_N AN_IN_P CLKin1_1_N CLKin1_1_P CLKout6_N CLKout6_P LMK_CLKin1_N LMK_CLKin1_P NetC1_1 NetC2_1 NetC3_2 NetC4_2 NetC5_1 NetC5_2 NetC6_2 NetC7_2 NetC8_2 NetC21_1 NetC21_2 NetC22_1 NetC22_2 NetC25_1 NetC25_2 NetC28_1 NetC28_2 NetC31_2 NetC32_1 NetC82_1 NetC82_2 NetC175_2 NetC176_1 NetC178_2 NetC179_1 NetC259_2 NetD1_6 NetD2_1 NetD2_3 NetFL1_A NetJ1_2 NetJ3_2 NetJ7_2 NetJ10_2 NetR1_2 NetR9_1 NetR40_2 NetR100_2 NetR107_2 Tor_RF_50 VCXO_OUT_N VCXO_OUT_P
net class Power_Line: 1V8@0A5_COM 1V8@1A 1V25@0A5 1V25@1A 2V5@1A 3V3@0A5 3V3@0A5_COM 3V3@1A_1 3V6_DCDC 6V_DCDC +12 CTRL_VCXO GND GND_VCXO NetC41_2 NetC45_2 NetC64_2 NetC66_2 VC_CTRL VC_SUPP VCC_5_ATT VCC_AMP_5 VDD_CORE VDD_IO VDD_OSC VDD_PLL1 VDD_PLL2CORE VDD_PLL2OSC VDDO_1/2 VDDO_3/4 VDDO_5 VDDO_6 VDDO_7/8 VDDO_9/10
net class Diff_100: ADC_CLK9690_N ADC_CLK9690_P adc_Sysref_N adc_Sysref_P AN_IN_9690_N AN_IN_9690_P AN_IN_N AN_IN_P CLKin1_N CLKin1_P CLKout1_N CLKout1_P CLKout3_N CLKout3_P CLKout6_N CLKout6_P CLKout6O_N CLKout6O_P CLKout8_N CLKout8_P CLKout10_N CLKout10_P LMK_CLKin1_N LMK_CLKin1_P O1_N O1_P O3_N O3_P OSCIN_N OSCIN_P VCXO_OUT_N VCXO_OUT_P
net class CLKDisToC: CLKout1_N CLKout1_P CLKout3_N CLKout3_P CLKout6_N CLKout6_P CLKout8_N CLKout8_P CLKout10_N CLKout10_P
net class CLK_In2: LMK_CLKin1_N LMK_CLKin1_P
net class CLK_In1: CLKin1_N CLKin1_P
net class CLK_Out: CLKout1_N CLKout1_P CLKout3_N CLKout3_P CLKout6_N CLKout6_P CLKout8_N CLKout8_P CLKout10_N CLKout10_P
net class Ain: AN_IN_9690_N AN_IN_9690_P
net class ADC_CLK: ADC_CLK9690_N ADC_CLK9690_P adc_Sysref_N adc_Sysref_P
component class U_Komunikacja: C19 C20 C23 C26 C94 C95 C239 C240 C241 C242 C243 C244 D10 R16 R17 R18 R22 R23 R24 R25 R26 R28 R29 R30 R33 R34 R35 R36 R43 R44 R45 R47 R48 R50 R51 R61 R63 R72 R73 R74 R75 R108 R109 R110 R114 R115 R116 R117 R134 R145 U4 U8 U10 U12 U13 U16 U32 U33
differential pair adc_Sysref: +adc_Sysref_P -adc_Sysref_N
differential pair AN_IN: +AN_IN_P -AN_IN_N
differential pair CLKout6O: +CLKout6O_P -CLKout6O_N
differential pair O3: +O3_P -O3_N
differential pair O1: +O1_P -O1_N
differential pair CLKout6: +CLKout6_P -CLKout6_N
differential pair CLKout10: +CLKout10_P -CLKout10_N
differential pair CLKout8: +CLKout8_P -CLKout8_N
differential pair CLKout3: +CLKout3_P -CLKout3_N
differential pair CMLout4_ADC: +CMLout4_ADC_P -CMLout4_ADC_N
differential pair CMLout3_ADC: +CMLout3_ADC_P -CMLout3_ADC_N
differential pair CMLout2_ADC: +CMLout2_ADC_P -CMLout2_ADC_N
differential pair CMLout1_ADC: +CMLout1_ADC_P -CMLout1_ADC_N
differential pair CLKin1: +CLKin1_P -CLKin1_N
differential pair SYNC: +SYNC_P -SYNC_N
differential pair OSCIN: +OSCIN_P -OSCIN_N
differential pair CMLout4: +CMLout4_P -CMLout4_N
differential pair CMLout3: +CMLout3_P -CMLout3_N
differential pair CMLout2: +CMLout2_P -CMLout2_N
differential pair CMLout1: +CMLout1_P -CMLout1_N
differential pair CLKin1_1: +CLKin1_1_P -CLKin1_1_N
differential pair AN_IN_9690: +AN_IN_9690_P -AN_IN_9690_N
differential pair ADC_CLK9690: +ADC_CLK9690_P -ADC_CLK9690_N
differential pair VCXO_OUT: +VCXO_OUT_P -VCXO_OUT_N
differential pair LMK_CLKin1: +LMK_CLKin1_P -LMK_CLKin1_N
differential pair CLKout1: +CLKout1_P -CLKout1_N

## Components (designator, comment, footprint, x,y, rotation, side; value= is the part's Value field where it differs from the comment)
C1 "4pF" "CAP 0201/0603 KK"#1 51.176,43.949 r180 bottom
C2 "1pF" "CAP 0201/0603 KK"#1 51.176,41.775 r180 bottom
C3 "100nF" "CAP 0201/0603 KK"#1 51.42,50.308 r270 bottom
C4 "100nF" "CAP 0201/0603 KK"#1 51.825,46.8 r90 top
C5 "1pF" "CAP 0201/0603 KK"#1 51.798,45.294 r180 top
C6 "100nF" "CAP 0201/0603 KK"#1 52.195,50.308 r270 bottom
C7 "4pF" "CAP 0201/0603 KK"#1 52.466,43.949 r180 bottom
C8 "1pF" "CAP 0201/0603 KK"#1 52.466,41.775 r180 bottom
C9 "100nF" "CAP 0201/0603 KK"#1 36.538,65.557 r90 bottom
C10 "10uF" "CAP 0402/1005 RF KK" 35.616,65.297 r270 bottom
C11 "330pF" "CAP 0402/1005 RF KK" 42.237,71.419 r90 bottom
C12 "330pF" "CAP 0402/1005 RF KK" 41.175,71.443 r90 bottom
C13 "330pF" "CAP 0402/1005 RF KK" 40.145,71.443 r90 bottom
C14 "330pF" "CAP 0402/1005 RF KK" 39.11,71.443 r90 bottom
C15 "100nF" "CAP 0201/0603 KK"#1 43.516,7.581 r270 bottom
C16 "100nF" "CAP 0201/0603 KK"#1 42.884,7.581 r270 bottom
C17 "100nF" "CAP 0201/0603 KK"#1 41.116,7.581 r270 bottom
C18 "100nF" "CAP 0201/0603 KK"#1 40.484,7.581 r270 bottom
C19 "100nF" "CAP 0201/0603 KK"#1 55.895,7.128 r270 top
C20 "100nF" "CAP 0201/0603 KK"#1 55.895,9.718 r90 top
C21 "100pF" "CAP 0201/0603 KK"#1 12.916,67.694 r0 bottom
C22 "100pF" "CAP 0201/0603 KK"#1 33.428,67.602 r0 bottom
C23 "100nF" "CAP 0201/0603 KK"#1 36.035,44.421 r270 top
C24 "2.2uF" "CAP 0402/1005 RF KK" 17.355,71.012 r90 top
C25 "33pF" "CAP 0402/1005 RF KK" 44.35,67.602 r0 bottom
C26 "100nF" "CAP 0201/0603 KK"#1 31.995,43.196 r270 top
C27 "10uF" "CAP 0603/1608 RF" 13.659,8.494 r90 top
C28 "33pF" "CAP 0402/1005 RF KK" 52.056,69.435 r225 bottom
C29 "100nF" "CAP 0402/1005 RF KK" 12.089,8.416 r90 top
C30 "560pF" "CAP 0402/1005 RF KK" 14.335,71.781 r270 bottom
C31 "470pF" "CAP 0603/1608 RF" 57.751,75.375 r270 bottom
C32 "33pF" "CAP 0402/1005 RF KK" 58.6,67.098 r270 bottom
C33 "470pF" "CAP 0603/1608 RF" 59.334,78.375 r270 bottom
C34 "100pF" "CAP 0402/1005 RF KK" 23.212,67.208 r90 top
C35 "100nF" "CAP 0201/0603 KK"#1 38.716,7.581 r270 bottom
C36 "100nF" "CAP 0201/0603 KK"#1 38.084,7.581 r270 bottom
C37 "4.7uF" "CAP 0603/1608 RF" 15.545,63.823 r90 top
C38 "100nF" "CAP 0201/0603 KK"#1 36.319,7.581 r270 bottom
C39 "100nF" "CAP 0201/0603 KK"#1 35.684,7.581 r270 bottom
C40 "10uF" "CAP 0603/1608 RF" 12.298,39.781 r90 top
C41 "100nF" "CAP 0201/0603 KK"#2 17.991,44.282 r0 top
C42 "10uF" "CAP 0603/1608 RF" 19.49,43.989 r270 top
C43 "10uF" "CAP 0603/1608 RF" 12.362,43.603 r270 top
C44 "100nF" "CAP 0201/0603 KK"#1 4.112,9.708 r0 bottom
C45 "100nF" "CAP 0201/0603 KK"#2 18.016,38.657 r0 top
C46 "10uF" "CAP 0603/1608 RF" 19.532,38.718 r90 top
C47 "1uF" "CAP 0402/1005 RF KK" 14.916,45.843 r90 top
C48 "22uF" "CAP 0603/1608 RF" 16.231,13.643 r180 top
C49 "4.7uF" "CAP 0402/1005 RF KK" 16.16,12.389 r180 top
C50 "100nF" "CAP 0201/0603 KK"#1 62.55,14.904 r270 top
C51 "1uF" "CAP 0402/1005 RF KK" 14.205,37.632 r270 top
C52 "10uF" "CAP 0603/1608 RF" 11.454,23.107 r90 top
C53 "100nF" "CAP 0201/0603 KK"#2 17.95,20.529 r0 top
C54 "10uF" "CAP 0603/1608 RF" 20.848,20.824 r90 top
C55 "10uF" "CAP 0603/1608 RF" 11.454,26.378 r270 top
C56 "100nF" "CAP 0201/0603 KK"#2 17.368,28.882 r0 top
C57 "10uF" "CAP 0603/1608 RF" 19.425,28.952 r270 top
C58 "1uF" "CAP 0402/1005 RF KK" 12.964,28.574 r180 top
C59 "1uF" "CAP 0402/1005 RF KK" 14.781,20.1 r0 top
C60 "1uF" "CAP 0402/1005 RF KK" 4.175,60.275 r90 top
C61 "2.2uF" "CAP 0402/1005 RF KK" 10.934,62.346 r180 top
C62 "1uF" "CAP 0402/1005 RF KK" 10.806,32.295 r270 top
C63 "100pF" "CAP 0402/1005 RF KK" 10.597,60.919 r180 top
C64 "1uF" "CAP 0201/0603 KK"#1 16.087,32.295 r270 top
C65 "1uF" "CAP 0402/1005 RF KK" 46.202,51.185 r0 bottom
C66 "1uF" "CAP 0201/0603 KK"#1 46.482,45.903 r0 bottom
C67 "4.7uF" "CAP 0402/1005 RF KK" 20.998,38.667 r90 top
C68 "4.7uF" "CAP 0402/1005 RF KK" 22.779,39.041 r180 top
C69 "100nF" "CAP 0201/0603 KK"#1 54.753,37.287 r90 top
C70 "1uF" "CAP 0402/1005 RF KK" 17.291,63.757 r90 top
C71 "4.7uF" "CAP 0402/1005 RF KK" 20.848,44.047 r270 top
C72 "4.7uF" "CAP 0402/1005 RF KK" 23.659,42.911 r90 top
C73 "10uF" "CAP 0603/1608 RF" 59.553,27.541 r180 top
C74 "10uF" "CAP 0603/1608 RF" 60.875,34.65 r180 top
C75 "4.7uF" "CAP 0402/1005 RF KK" 16.731,33.63 r0 top
C76 "4.7uF" "CAP 0402/1005 RF KK" 18.356,34.155 r270 top
C77 "4.7uF" "CAP 0402/1005 RF KK" 45.244,45.035 r270 bottom
C78 "4.7uF" "CAP 0402/1005 RF KK" 44.994,43.31 r0 bottom
C79 "10uF" "CAP 0603/1608 RF" 60.875,33.2 r180 top
C80 "10uF" "CAP 0603/1608 RF" 46.029,31.05 r0 top
C81 "10uF" "CAP 0603/1608 RF" 45.354,34.13 r270 top
C82 "100pF" "CAP 0201/0603 KK"#1 20.67,69.887 r180 bottom
C83 "100pF" "CAP 0201/0603 KK"#1 33.838,72.402 r0 bottom
C84 "100nF" "CAP 0201/0603 KK"#1 16.344,78.291 r45 bottom
C85 "100nF" "CAP 0201/0603 KK"#1 24.788,76.363 r180 bottom
C86 "560pF" "CAP 0201/0603 KK"#1 9.536,10.681 r0 top
C87 "10uF" "CAP 0603/1608 RF" 3.74,19.109 r0 top
C88 "100nF" "CAP 0201/0603 KK"#1 59.3,28.787 r180 top
C89 "100nF" "CAP 0201/0603 KK"#1 60.51,31.925 r180 top
C90 "100nF" "CAP 0402/1005 RF KK" 3.315,20.8 r0 top
C91 "22uF" "CAP 0603/1608 RF" 7.671,25.542 r180 top
C92 "4.7uF" "CAP 0402/1005 RF KK" 7.421,24.127 r180 top
C93 "820pF" "CAP 0201/0603 KK"#1 1.023,22.621 r0 top
C94 "100nF" "CAP 0201/0603 KK"#1 42.9,23.964 r90 top
C95 "100nF" "CAP 0201/0603 KK"#1 46.8,24.162 r270 top
C96 "1uF" "CAP 0402/1005 RF KK" 24.221,46.354 r270 top
C97 "1uF" "CAP 0201/0603 KK"#1 29.571,45.989 r270 top
C99 "100nF" "CAP 0201/0603 KK"#1 46.918,28.948 r0 bottom
C100 "100nF" "CAP 0201/0603 KK"#1 46.977,36.924 r0 bottom
C101 "100nF" "CAP 0201/0603 KK"#1 46.918,28.21 r0 bottom
C102 "100nF" "CAP 0201/0603 KK"#1 46.977,36.178 r0 bottom
C103 "100nF" "CAP 0201/0603 KK"#1 49.204,39.213 r270 bottom
C104 "100nF" "CAP 0201/0603 KK"#1 54.483,39.983 r270 bottom
C105 "100nF" "CAP 0201/0603 KK"#1 55.258,39.983 r270 bottom
C106 "100nF" "CAP 0201/0603 KK"#1 56.033,39.983 r270 bottom
C107 "100nF" "CAP 0201/0603 KK"#1 56.808,39.983 r270 bottom
C108 "100nF" "CAP 0201/0603 KK"#1 52.938,26.436 r90 bottom
C109 "100nF" "CAP 0201/0603 KK"#1 53.697,26.432 r90 bottom
C110 "100nF" "CAP 0201/0603 KK"#1 54.459,26.429 r90 bottom
C111 "100nF" "CAP 0201/0603 KK"#1 50.652,26.436 r90 bottom
C113 "100nF" "CAP 0201/0603 KK"#1 46.977,37.669 r0 bottom
C114 "100nF" "CAP 0201/0603 KK"#1 47.698,39.212 r270 bottom
C115 "100nF" "CAP 0201/0603 KK"#1 48.454,39.208 r270 bottom
C116 "100nF" "CAP 0201/0603 KK"#1 46.977,35.432 r0 bottom
C117 "100nF" "CAP 0201/0603 KK"#1 46.918,27.471 r0 bottom
C118 "100nF" "CAP 0201/0603 KK"#1 46.918,29.687 r0 bottom
C119 "100nF" "CAP 0201/0603 KK"#1 49.887,26.432 r90 bottom
C120 "100nF" "CAP 0201/0603 KK"#1 49.116,26.432 r90 bottom
C121 "100nF" "CAP 0201/0603 KK"#1 48.868,32.275 r180 top
C122 "100nF" "CAP 0201/0603 KK"#1 52.183,26.441 r90 bottom
C123 "100nF" "CAP 0201/0603 KK"#1 51.414,26.429 r90 bottom
C124 "100nF" "CAP 0201/0603 KK"#1 53.697,39.958 r270 bottom
C125 "100nF" "CAP 0201/0603 KK"#1 49.95,39.22 r270 bottom
C126 "1uF" "CAP 0402/1005 RF KK" 58.553,47.85 r0 bottom
C127 "1uF" "CAP 0201/0603 KK"#1 58.143,42.452 r0 bottom
C132 "100nF" "CAP 0201/0603 KK"#1 57.593,38.4 r90 top
C133 "100nF" "CAP 0201/0603 KK"#1 58.552,39.685 r270 top
C134 "100nF" "CAP 0201/0603 KK"#1 46.269,29.881 r0 top
C136 "100nF" "CAP 0201/0603 KK"#1 58.112,39.968 r180 bottom
C137 "100nF" "CAP 0201/0603 KK"#1 55.221,26.436 r90 bottom
C138 "100nF" "CAP 0201/0603 KK"#1 43.496,34.502 r0 top
C139 "100nF" "CAP 0201/0603 KK"#1 43.496,33.721 r0 top
C150 "100nF" "CAP 0201/0603 KK"#1 30.063,19.817 r90 top
C151 "100nF" "CAP 0201/0603 KK"#1 31.342,19.817 r90 top
C152 "100nF" "CAP 0201/0603 KK"#1 29.195,22.311 r90 top
C153 "10uF" "CAP 0402/1005 RF KK" 32.024,23.362 r90 top
C154 "100nF" "CAP 0201/0603 KK"#1 34.529,38.4 r270 top
C155 "100nF" "CAP 0201/0603 KK"#1 35.681,39.141 r0 top
C156 "100nF" "CAP 0201/0603 KK"#1 38.427,37.193 r270 top
C157 "10uF" "CAP 0402/1005 RF KK" 37.375,37.458 r270 top
C158 "100nF" "CAP 0201/0603 KK"#1 30.655,39.238 r180 top
C159 "100nF" "CAP 0201/0603 KK"#1 28.624,38.112 r90 top
C160 "100nF" "CAP 0201/0603 KK"#1 30.582,35.379 r180 top
C161 "10uF" "CAP 0402/1005 RF KK" 28.624,36.613 r270 top
C162 "100nF" "CAP 0201/0603 KK"#1 42.792,32.877 r180 top
C163 "100nF" "CAP 0201/0603 KK"#1 42.792,31.932 r180 top
C164 "100nF" "CAP 0201/0603 KK"#1 38.272,33.517 r90 top
C165 "10uF" "CAP 0402/1005 RF KK" 38.586,34.881 r180 top
C166 "100nF" "CAP 0201/0603 KK"#1 32.621,19.817 r90 top
C167 "100nF" "CAP 0201/0603 KK"#1 33.9,19.817 r90 top
C171 "10uF" "CAP 0402/1005 RF KK" 37.108,35.395 r90 bottom
C172 "10uF" "CAP 0402/1005 RF KK" 32.227,22.962 r180 bottom
C173 "10uF" "CAP 0402/1005 RF KK" 34.552,23.728 r270 bottom
C174 "100nF" "CAP 0201/0603 KK"#1 35.046,24.851 r180 top
C175 "100nF" "CAP 0201/0603 KK"#1 34.681,44.161 r270 bottom
C176 "100nF" "CAP 0201/0603 KK"#1 34.706,39.803 r270 bottom
C177 "100pF" "CAP 0402/1005 RF KK" 32.682,52.881 r180 bottom
C178 "100nF" "CAP 0201/0603 KK"#1 33.928,44.161 r270 bottom
C179 "100nF" "CAP 0201/0603 KK"#1 33.961,39.803 r270 bottom
C180 "10uF" "CAP 0402/1005 RF KK" 34.629,23.399 r90 top
C181 "100nF" "CAP 0201/0603 KK"#1 25.047,27.1 r90 top
C182 "100nF" "CAP 0201/0603 KK"#1 24.3,27.1 r90 top
C183 "100nF" "CAP 0201/0603 KK"#1 44.257,33.677 r0 bottom
C184 "100nF" "CAP 0201/0603 KK"#1 27.199,28.487 r90 top
C185 "100nF" "CAP 0201/0603 KK"#1 44.257,34.373 r0 bottom
C186 "100nF" "CAP 0201/0603 KK"#1 44.258,30.83 r0 bottom
C187 "100nF" "CAP 0201/0603 KK"#1 44.258,31.534 r0 bottom
C188 "100nF" "CAP 0201/0603 KK"#1 45.93,6.543 r270 bottom
C189 "100nF" "CAP 0201/0603 KK"#1 45.306,6.543 r270 bottom
C190 "10uF" "CAP 0402/1005 RF KK" 26.298,27.22 r180 top
C191 "100nF" "CAP 0201/0603 KK"#1 42.792,30.037 r180 top
C192 "100nF" "CAP 0201/0603 KK"#1 42.792,31.063 r180 top
C193 "100nF" "CAP 0201/0603 KK"#1 38.303,31.209 r270 top
C194 "10uF" "CAP 0402/1005 RF KK" 39.138,32.457 r0 top
C195 "100nF" "CAP 0201/0603 KK"#1 35.179,19.817 r90 top
C196 "100nF" "CAP 0201/0603 KK"#1 36.425,19.817 r90 top
C197 "100nF" "CAP 0201/0603 KK"#1 38.194,23.279 r90 top
C198 "10uF" "CAP 0402/1005 RF KK" 37.237,23.439 r90 top
C199 "100nF" "CAP 0201/0603 KK"#1 23.466,30.813 r90 top
C200 "100nF" "CAP 0201/0603 KK"#1 23.496,32.032 r270 top
C201 "100nF" "CAP 0201/0603 KK"#1 27.191,31.027 r90 top
C202 "10uF" "CAP 0402/1005 RF KK" 26.298,29.776 r180 top
C203 "100nF" "CAP 0201/0603 KK"#1 42.792,29.119 r180 top
C204 "100nF" "CAP 0201/0603 KK"#1 40.789,27.541 r0 top
C205 "100nF" "CAP 0201/0603 KK"#1 39.435,27.541 r180 top
C206 "10uF" "CAP 0402/1005 RF KK" 38.952,29.972 r0 top
C207 "100nF" "CAP 0201/0603 KK"#1 38.541,44.346 r180 bottom
C208 "100nF" "CAP 0201/0603 KK"#1 38.521,45.15 r180 bottom
C209 "100nF" "CAP 0201/0603 KK"#1 37.639,48.614 r270 bottom
C210 "10uF" "CAP 0402/1005 RF KK" 38.664,48.549 r270 bottom
C211 "100nF" "CAP 0201/0603 KK"#1 26.548,34.988 r270 top
C212 "100nF" "CAP 0201/0603 KK"#1 25.047,34.988 r270 top
C213 "100nF" "CAP 0201/0603 KK"#1 27.465,33.461 r90 top
C214 "10uF" "CAP 0402/1005 RF KK" 26.263,32.21 r180 top
C215 "100nF" "CAP 0201/0603 KK"#1 32.029,38.828 r270 top
C216 "100nF" "CAP 0201/0603 KK"#1 33.321,39.141 r180 top
C217 "100nF" "CAP 0201/0603 KK"#1 32.682,35.389 r0 top
C218 "10uF" "CAP 0402/1005 RF KK" 31.699,36.658 r0 top
C222 "4.7uF" "CAP 0603/1608 RF" 26.728,49.86 r90 bottom
C223 "100nF" "CAP 0201/0603 KK"#1 33.896,55.54 r180 top
C224 "100nF" "CAP 0201/0603 KK"#1 33.896,54.79 r180 top
C225 "100nF" "CAP 0201/0603 KK"#1 29.468,35.22 r270 bottom
C226 "100nF" "CAP 0201/0603 KK"#1 30.187,35.22 r270 bottom
C227 "100nF" "CAP 0201/0603 KK"#1 41.564,6.933 r270 top
C228 "100nF" "CAP 0201/0603 KK"#1 40.85,6.933 r270 top
C239 "100nF" "CAP 0201/0603 KK"#1 31.186,41.763 r0 top
C240 "100nF" "CAP 0201/0603 KK"#1 31.199,43.196 r270 top
C241 "1uF" "CAP 0402/1005 RF KK" 61.65,50.2 r180 top
C242 "1uF" "CAP 0402/1005 RF KK" 21.636,56.551 r270 top
C243 "100nF" "CAP 0201/0603 KK"#1 48.608,7.207 r270 top
C244 "100nF" "CAP 0201/0603 KK"#1 48.075,9.342 r180 top
C252 "100pF" "CAP 0201/0603 KK"#1 14.175,67.435 r90 bottom
C253 "100pF" "CAP 0201/0603 KK"#1 34.699,67.34 r90 bottom
C256 "100pF" "CAP 0201/0603 KK"#1 45.841,67.428 r90 bottom
C257 "100pF" "CAP 0201/0603 KK"#1 53.13,70.875 r315 bottom
C259 "100pF" "CAP 0201/0603 KK"#1 57.275,72.572 r90 bottom
D1 "MADP-011029-14150T" ODS-1415 15.62,68.12 r0 bottom
D2 "CLA4611-085LF" CLA4611-085LF 25.319,67.582 r0 bottom
D3 "LTST-C190GKT" "LED 0603/1608 GREEN" 3.031,40.283 r0 top
D4 "LTST-C190GKT" "LED 0603/1608 GREEN" 3.044,33.968 r0 top
D5 "CLA4603-085LF" CLA4611-085LF 29.295,67.582 r0 bottom
D6 "LTST-C190GKT" "LED 0603/1608 GREEN" 3.031,38.7 r0 top
D7 "LTST-C190GKT" "LED 0603/1608 GREEN" 3.031,32.38 r0 top
D8 "LTST-C190GKT" "LED 0603/1608 GREEN" 3.031,37.125 r0 top
D9 "LTST-C190GKT" "LED 0603/1608 GREEN" 3.031,35.543 r0 top
D10 "LTST-C190GKT" "LED 0603/1608 GREEN" 50.808,55.163 r180 top
FB1 "10R" "FER 0402/1005 KK" 3.449,11.588 r0 top
FB2 "120R" "FER 0402/1005 KK" 34.309,65 r90 bottom
FB3 "120R" "FER 0402/1005 KK" 57.702,78.375 r270 bottom
FB4 "120R" "FER 0603/1608 KK" 46.802,43.91 r270 bottom
FB5 "10R" "FER 0402/1005 KK" 3.449,17.65 r0 top
FB6 "10R" "FER 0402/1005 KK" 3.449,15.221 r0 top
FB7 "120R" "FER 0603/1608 KK" 21.748,40.466 r0 top
FB11 "10R" "FER 0402/1005 KK" 2.944,60.479 r90 top
FB13 "10R" "FER 0402/1005 KK" 3.449,14.006 r0 top
FB14 "10R" "FER 0402/1005 KK" 3.449,16.435 r0 top
FB15 "220R" "FER 0603/1608 KK" 30.726,22.404 r90 top
FB16 "220R" "FER 0603/1608 KK" 35.866,37.413 r270 top
FB17 "220R" "FER 0603/1608 KK" 30.061,37.415 r270 top
FB18 "220R" "FER 0603/1608 KK" 40.02,33.647 r180 top
FB19 "220R" "FER 0603/1608 KK" 33.336,22.404 r90 top
FB20 "220R" "FER 0603/1608 KK" 25.306,28.514 r0 top
FB22 "220R" "FER 0603/1608 KK" 40.02,31.248 r180 top
FB23 "220R" "FER 0603/1608 KK" 35.925,22.404 r90 top
FB24 "220R" "FER 0603/1608 KK" 25.388,30.983 r0 top
FB25 "220R" "FER 0603/1608 KK" 40.073,28.806 r180 top
FB26 "220R" "FER 0603/1608 KK" 40.087,46.773 r180 bottom
FB27 "220R" "FER 0603/1608 KK" 25.398,33.48 r0 top
FB28 "220R" "FER 0603/1608 KK" 33.279,37.423 r270 top
FB29 "120R" "FER 0603/1608 KK" 38.545,50.86 r0 bottom
FB30 "10R" "FER 0402/1005 KK" 3.449,12.792 r0 top
FB31 "120R" "FER 0603/1608 KK" 22.463,42.911 r90 top
FB32 "120R" "FER 0603/1608 KK" 18.081,32.23 r0 top
FL1 "TA1954A" TA1954A 49.725,67.688 r180 bottom
H1 "6.5x0.8x1.27mm" 36900000 16.416,61.365 r180 bottom
H2 "6.5x0.8x1.27mm" 36900000 53.405,81.075 r180 bottom
H3 "6.5x0.8x1.27mm" 36900000 62.05,66.275 r270 bottom
H4 "6.5x0.8x1.27mm" 36900000 10.375,75.275 r270 bottom
H5 "6.5x0.8x1.27mm" 36900000 15.825,81.075 r0 bottom
H6 "6.5x0.8x1.27mm" 36900000 62.05,75.475 r270 bottom
H7 "6.5x0.8x1.27mm" 36900000 50,61.365 r180 bottom
H8 "6.5x0.8x1.27mm" 36900000 32.659,61.365 r0 bottom
J1 "1909763-1" TECO-1909763-1_V 20.124,75.77 r90 top
J2 "32K101-400L5" ROS-32K101-400L5_V 5.658,67.694 r90 top
J3 "1909763-1" TECO-1909763-1_V 25.731,73.578 r45 top
J7 "1909763-1" TECO-1909763-1_V 45.785,74.214 r0 top
J8 "1909763-1" TECO-1909763-1_V 30.598,57.926 r0 top
J10 "1909763-1" TECO-1909763-1_V 56.97,71.532 r90 top
J11 "1909763-1" TECO-1909763-1_V 30.598,52.398 r180 top
L1 "43nH" "IND 0402/1005 RF WW" 27.349,67.131 r90 bottom
L2 "2.7nH, 0.64A" WE-KI_0402 11.575,68.107 r90 bottom
L3 "20nH, 0.42A" WE-KI_0402 58.68,72.86 r225 bottom
L4 "43nH" "IND 0402/1005 RF WW" 31.736,68.042 r270 bottom
L5 "2.2uH, 5.2A" WE-MAPI_4030 14.291,16.903 r0 top
L6 "2.2uH, 5.2A" WE-MAPI_4030 5.85,28.77 r0 top
P1 "PCIeMini-CN-2S-M-R52" PCIeMini-GF-2D-800-1K-S52 35,1.4 r0 top locked
R1 "10R" "RES 0201/0603"#1 51.42,48.898 r270 bottom
R2 "0mR" "RES 0402/1005 RF KK" 51.259,46.158 r270 bottom
R3 "10R" "RES 0201/0603"#1 51.436,42.831 r270 bottom
R4 "0mR" "RES 0402/1005 RF KK" 51.279,40.341 r270 bottom
R5 "49.9R" "RES 0201/0603"#1 51.05,47.729 r0 bottom
R6 "10R" "RES 0201/0603"#1 51.111,44.676 r0 bottom
R7 "49.9R" "RES 0201/0603"#1 51.798,51.452 r180 bottom
R8 "10R" "RES 0201/0603"#1 52.531,44.676 r0 bottom
R9 "49.9R" "RES 0201/0603"#1 52.554,47.724 r0 bottom
R10 "10R" "RES 0201/0603"#1 52.195,48.898 r270 bottom
R11 "0mR" "RES 0402/1005 RF KK" 52.343,46.158 r270 bottom
R12 "10R" "RES 0201/0603"#1 52.206,42.831 r270 bottom
R13 "0mR" "RES 0402/1005 RF KK" 52.349,40.341 r270 bottom
R14 "100R" "RES 0201/0603"#1 45.614,31.209 r270 bottom
R15 "FCSL110R005FER" FCSL110R005FERCT-ND 13.379,7.132 r90 bottom locked
R16 "1kR" "RES 0402/1005 RF KK" 32.349,8.081 r0 top
R17 "1kR" "RES 0402/1005 RF KK" 32.349,6.705 r180 top
R18 "1kR" "RES 0402/1005 RF KK" 61.309,8.253 r0 top
R19 "75kR" "RES 0402/1005 RF KK" 15.056,32.505 r270 top
R20 "0mR" "RES 0402/1005 RF KK" 64.473,19.175 r0 top
R21 "10kR" "RES 0402/1005 RF KK" 66.275,8.108 r90 top
R22 "1kR" "RES 0402/1005 RF KK" 65.066,55.31 r270 top
R23 "1kR" "RES 0402/1005 RF KK" 67.51,55.31 r270 top
R24 "1kR" "RES 0402/1005 RF KK" 66.275,55.31 r270 top
R25 "0mR" "RES 0402/1005 RF KK" 67.51,57.86 r270 top
R26 "0mR" "RES 0402/1005 RF KK" 66.275,57.86 r270 top
R27 "10kR" "RES 0402/1005 RF KK" 64.473,17.943 r180 top
R28 "0mR" "RES 0402/1005 RF KK" 65.066,57.86 r270 top
R29 "1kR" "RES 0402/1005 RF KK" 58.375,11.492 r180 top
R30 "1kR" "RES 0402/1005 RF KK" 5.95,52.922 r270 top
R31 "68R" "RES 0402/1005 RF KK" 12.656,70.695 r180 bottom
R32 "1kR" "RES 0402/1005 RF KK" 22.176,63.869 r180 top
R33 "1kR" "RES 0402/1005 RF KK" 8.436,52.922 r270 top
R34 "1kR" "RES 0402/1005 RF KK" 7.192,52.922 r270 top
R35 "0mR" "RES 0402/1005 RF KK" 5.95,55.949 r270 top
R36 "20kR" "RES 0402/1005 RF KK" 59.303,13.551 r0 top
R37 "100kR" "RES 0402/1005 RF KK" 9.446,50.52 r0 top
R38 "100kR" "RES 0402/1005 RF KK" 9.458,49.366 r0 top
R39 "1kR" "RES 0402/1005 RF KK" 42.562,63.787 r270 bottom
R40 "4.99R" "RES 0402/1005 RF KK" 18.504,67.582 r0 bottom
R41 "51R" "RES 0402/1005 RF KK" 35.107,56.253 r270 top
R42 "100kR" "RES 0402/1005 RF KK" 9.458,48.199 r0 top
R43 "1kR" "RES 0402/1005 RF KK" 32.509,10.29 r270 top
R44 "1kR" "RES 0402/1005 RF KK" 34.221,10.374 r270 top
R45 "0mR" "RES 0402/1005 RF KK" 7.192,55.949 r270 top
R46 "22R" "RES 0402/1005 RF KK" 59.334,75.375 r90 bottom
R47 "0mR" "RES 0402/1005 RF KK" 8.436,55.949 r270 top
R48 "10kR" "RES 0402/1005 RF KK" 47.201,6.893 r90 top
R49 "10kR" "RES 0402/1005 RF KK" 17.263,77.477 r225 bottom
R50 "0mR" "RES 0402/1005 RF KK" 29.7,8.088 r0 top
R51 "0mR" "RES 0402/1005 RF KK" 29.7,6.705 r0 top
R52 "100kR" "RES 0402/1005 RF KK" 9.458,47.042 r0 top
R53 "49.9kR" "RES 0402/1005 RF KK" 13.606,34.355 r0 top
R54 "10kR" "RES 0402/1005 RF KK" 63.656,8.108 r90 top
R55 "0mR" "RES 0402/1005 RF - 3-PADS"#1 47.423,67.693 r180 bottom
R56 "82.5kR" "RES 0402/1005 RF KK" 46.202,46.935 r0 bottom
R57 "5.62kR" "RES 0402/1005 RF KK" 17.791,45.332 r0 top
R58 "10kR" "RES 0402/1005 RF KK" 16.116,45.807 r270 top
R59 "2.43kR" "RES 0402/1005 RF KK" 17.991,37.632 r0 top
R60 "1.15kR" "RES 0402/1005 RF KK" 16.314,37.137 r90 top
R61 "20kR" "RES 0402/1005 RF KK" 31.639,46.91 r270 top
R62 "0mR" "RES 0402/1005 RF KK" 15.606,11.253 r0 top
R63 "0mR" "RES 0402/1005 RF KK" 23.387,55.751 r180 top
R64 "3.57kR" "RES 0402/1005 RF KK" 18.131,21.478 r0 top
R65 "1.15kR" "RES 0402/1005 RF KK" 16.451,20.838 r90 top
R66 "1.87kR" "RES 0402/1005 RF KK" 17.283,27.918 r0 top
R67 "1.5kR" "RES 0402/1005 RF KK" 15.027,29.15 r270 top
R68 "14.7kR" "RES 0402/1005 RF KK" 44.127,48.41 r270 bottom
R69 "10kR" "RES 0402/1005 RF KK" 64.973,8.108 r90 top
R70 "0mR" "RES 0402/1005 RF KK" 63.656,5.695 r90 top
R71 "0mR" "RES 0402/1005 RF KK" 64.973,5.695 r90 top
R72 "10kR" "RES 0402/1005 RF KK" 28.05,9.919 r90 top
R73 "10kR" "RES 0402/1005 RF KK" 52.033,11.832 r90 top
R74 "0mR" "RES 0402/1005 RF KK" 47.329,25.845 r180 top
R75 "0mR" "RES 0402/1005 RF KK" 50.955,13.019 r270 top
R76 "1kR" "RES 0402/1005 RF KK" 3.031,33.968 r0 bottom
R77 "560R" "RES 0402/1005 RF KK" 3.03,40.277 r0 bottom
R78 "560R" "RES 0402/1005 RF KK" 3.05,37.126 r0 bottom
R79 "51R" "RES 0402/1005 RF KK" 35.366,40.937 r0 bottom
R80 "1.5kR" "RES 0402/1005 RF KK" 3.03,32.38 r0 bottom
R81 "4.99R" "RES 0402/1005 RF KK" 22.46,67.582 r0 bottom
R82 "" "RES 0402/1005 RF - 3-PADS"#2 32.386,77.036 r270 bottom
R83 "10kR" "RES 0402/1005 RF KK" 10.618,55.004 r270 top
R84 "51R" "RES 0402/1005 RF KK" 33.233,40.937 r0 bottom
R85 "" "RES 0402/1005 RF - 3-PADS"#2 32.03,74.171 r270 bottom
R86 "220R" "RES 0402/1005 RF KK" 20.41,68.082 r90 bottom
R87 "61.9R" "RES 0402/1005 RF KK" 20.41,71.47 r270 bottom
R88 "49.9R" "RES 0402/1005 RF KK" 22.185,70.387 r90 bottom
R89 "0mR" "RES 0402/1005 RF KK" 27.969,49.679 r90 bottom
R90 "0mR" "RES 0402/1005 RF KK" 34.876,42.452 r270 bottom
R91 "0mR" "RES 0402/1005 RF KK" 33.733,42.454 r270 bottom
R92 "100R" "RES 0402/1005 RF KK" 36.33,55.163 r270 top
R93 "40.2kR" "RES 0402/1005 RF KK" 29.257,72.139 r270 bottom
R94 "0mR" "RES 0402/1005 RF KK" 25.738,11.649 r90 top
R95 "100R" "RES 0402/1005 RF KK" 25.207,13.519 r180 top
R96 "0mR" "RES 0402/1005 RF KK" 24.701,11.649 r90 top
R97 "51R" "RES 0402/1005 RF KK" 35.108,54.075 r90 top
R98 "" "RES 0402/1005 RF KK" 43.209,6.485 r0 bottom
R99 "100R" "RES 0201/0603"#2 65.779,35.02 r90 bottom
R100 "0mR" "RES 0402/1005 RF KK" 24.788,73.845 r0 bottom
R101 "100R" "RES 0201/0603"#2 45.317,34.026 r270 bottom
R102 "0mR" "RES 0402/1005 RF - 3-PADS"#1 58.6,69.535 r90 bottom
R103 "1kR" "RES 0402/1005 RF KK" 30.569,72.127 r270 bottom
R104 "" "RES 0402/1005 RF KK" 40.81,6.493 r0 bottom
R105 "" "RES 0402/1005 RF KK" 38.411,6.493 r0 bottom
R106 "4.02kR" "RES 0402/1005 RF KK" 24.788,75.129 r0 bottom
R107 "0mR" "RES 0402/1005 RF - 3-PADS"#1 26.285,72.288 r45 bottom
R108 "20kR" "RES 0402/1005 RF KK" 26.262,41.236 r90 top
R109 "20kR" "RES 0402/1005 RF KK" 45.1,27.27 r270 top
R110 "0mR" "RES 0402/1005 RF KK" 30.061,14.278 r180 top
R111 "1kR" "RES 0402/1005 RF KK" 21.333,8.944 r270 top
R112 "1kR" "RES 0402/1005 RF KK" 22.691,8.944 r270 top
R113 "" "RES 0402/1005 RF KK" 36.008,6.493 r0 bottom
R114 "200kR" "RES 0402/1005 RF KK" 32.202,14.278 r0 top
R115 "20kR" "RES 0402/1005 RF KK" 54.7,8.703 r270 top
R116 "20kR" "RES 0402/1005 RF KK" 61.294,7.018 r180 top
R117 "0mR" "RES 0402/1005 RF KK" 23.387,57.076 r0 top
R118 "51.1kR" "RES 0402/1005 RF KK" 9.881,15.028 r90 top
R119 "0mR" "RES 0402/1005 RF KK" 66.275,5.695 r90 top
R120 "100kR" "RES 0402/1005 RF KK" 11.156,15.028 r270 top
R121 "14.7kR" "RES 0402/1005 RF KK" 9.881,12.753 r90 top
R122 "95.3kR" "RES 0402/1005 RF KK" 1.56,26.917 r90 top
R123 "0mR" "RES 0402/1005 RF KK" 7.421,22.822 r0 top
R124 "100kR" "RES 0402/1005 RF KK" 2.723,26.908 r270 top
R125 "14.7kR" "RES 0402/1005 RF KK" 1.56,24.592 r90 top
R126 "82.5kR" "RES 0402/1005 RF KK" 28.546,46.788 r270 top
R127 "14.7kR" "RES 0402/1005 RF KK" 28.046,48.474 r0 top
R128 "127kR" "RES 0402/1005 RF KK" 58.143,43.425 r0 bottom
R129 "0mR" "RES 0402/1005 RF KK" 21.333,6.425 r270 top
R130 "0mR" "RES 0402/1005 RF KK" 22.691,6.425 r270 top
R131 "48.7kR" "RES 0402/1005 RF KK" 56.168,44.95 r270 bottom
R132 "560R" "RES 0402/1005 RF KK" 3.05,38.687 r0 bottom
R133 "1kR" "RES 0402/1005 RF KK" 3.031,35.543 r0 bottom
R134 "1kR" "RES 0402/1005 RF KK" 53.573,55.163 r0 top
R135 "100R" "RES 0201/0603"#2 42.512,34.042 r270 bottom
R136 "100R" "RES 0201/0603"#2 42.678,30.104 r0 bottom
R145 "1kR" "RES 0402/1005 RF KK" 53.489,9.703 r90 top
T1 "SI2342DS-T1-GE3" SI2342DS-T1-GE3 17.069,73.712 r225 bottom
T2 "SI2342DS-T1-GE3" SI2342DS-T1-GE3 20.224,76.889 r225 bottom
U1 "AD9690" AD9690 53.308,33.025 r270 bottom
U2 "HMC472ALP4E" HMC472ALP4E 40.139,67.35 r0 bottom
U3 "INA226AIDGSR" INA226 4.524,7.375 r0 bottom
U4 "MCP23017T-E/ML" MCP23017/MCP23S17#1 59.375,55.725 r90 top
U5 "AP2210K-5.0TRG1" AP2210K-3.3TRG1 20.755,67.201 r90 top
U6 "24LC32AT-I/SN" "8-SOIC 3.9" 65.64,13.275 r90 top
U7 "TPS7A8801RTJT" TPS7A88 15.97,41.423 r0 top
U8 "SN74AXC4T774RSVR" 16-UGFN 50.77,8.358 r90 top
U9 "LMK04610RTQR" LMK04610 32.831,29.7 r90 bottom locked
U10 "SN74AXC4T774RSVR" 16-UGFN 58.103,8.053 r90 top
U11 "1720BL15A0100E" 1600BL15B100 56.19,64.4 r180 bottom
U12 "TXB0101DRLT" "6-SOT DRL0006A" 45.02,25.127 r180 top
U13 "TXB0101DRLT" "6-SOT DRL0006A" 34.294,44.676 r180 top
U14 "BGA616" GPS05605 55.209,72.182 r0 bottom
U15 "ADL5910ACPZN-R7" ADL5910 28.433,75.539 r45 bottom
U16 "PCA9306DQER" PCA9306 30.851,10.444 r90 top
U17 "TPS62130RGTR" VQFN50P300x300-16-EPAD 12.556,12.003 r270 top
U18 "TPS7A8801RTJT" TPS7A88 15.093,24.732 r0 top
U19 "ADP125ACPZ-R7" ADP124_125_KK 12.827,32.38 r180 top
U20 "AP2210K-5.0TRG1" AP2210K-3.3TRG1 7.458,61.462 r0 top
U21 "ADP125ACPZ-R7" ADP124_125_KK 46.144,49.164 r90 bottom
U22 "TPS62130RGTR" VQFN50P300x300-16-EPAD 4.05,23.842 r270 top
U23 "ADP125ACPZ-R7" ADP124_125_KK 26.396,46.479 r180 top
U24 "ADP125ACPZ-R7" ADP124_125_KK 58.303,45.7 r90 bottom
U32 "TXB0304RSVR" TXB0304 28.724,42.336 r270 top
U33 "MCP23017T-E/ML" MCP23017/MCP23S17#2 17.03,55.391 r180 top
X1 "VG-4513CA122.8800M-GFCT3" VG-4513CA 32.986,48.76 r270 bottom

## Footprints (in the part's own frame and the unit in brackets; to place one, negate y for a bottom-side part, rotate by r counter-clockwise, add the part's x,y. Pads: shape width x height; smd on the part's side, far side on the other; paste and mask are expansions set on the pad)
"6-SOT DRL0006A" [mm] "SOTFL, 6-Leads, Body 1,60x1,60mm, Pitch 0,50mm, IPC High Density"
  rect 0.67x0.3 smd mask+0.05: 1(-0.74,0.5) 2(-0.74,0) 3(-0.74,-0.5) 4(0.74,-0.5) 5(0.74,0) 6(0.74,0.5)
  silkscreen extent -0.87,-0.85 0.05,1.32, body extent -0.8,-0.85 0.8,0.85, height 0.6
"8-SOIC 3.9" [mm] "SOIC, 8-Leads, Body 4,90x3,90mm, Pitch 1,27mm, IPC High Density"
  rect 1.55x0.6 smd: 1(-2.7,1.905) 2(-2.7,0.635) 3(-2.7,-0.635) 4(-2.7,-1.905) 5(2.7,-1.905) 6(2.7,-0.635) 7(2.7,0.635) 8(2.7,1.905)
  silkscreen extent -2.82,-2.45 1.55,2.88, body extent -3,-2.45 3,2.45, height 1.75
16-UGFN [mm] "QFN, 16-Leads, Body 1,80x2,60mm, Pitch 0,40mm, IPC High Density"
  rect 0.7x0.2 smd mask+0.052: 1(-0.75,0.6)
  rect 0.6x0.2 smd mask+0.052: 2(-0.8,0.2) 3(-0.8,-0.2) 4(-0.8,-0.6) 9(0.8,-0.6) 10(0.8,-0.2) 11(0.8,0.2) 12(0.8,0.6)
  rect 0.2x0.6 smd mask+0.052: 5(-0.6,-1.2) 6(-0.2,-1.2) 7(0.2,-1.2) 8(0.6,-1.2) 13(0.6,1.2) 14(0.2,1.2) 15(-0.2,1.2) 16(-0.6,1.2)
  silkscreen extent -1.27,1.58 -1.18,1.67, body extent -0.97,-1.38 0.97,1.38, height 0.55
1600BL15B100 [mm] "1.7GHz 1:2 Ratio RF Balun, EIA 0805 SMD"
  rect 0.5x0.3 smd: 1(-0.65,0.65) 2(-0.65,0) 3(-0.65,-0.65) 4(0.65,-0.65) 5(0.65,0) 6(0.65,0.65)
  silkscreen extent -1.06,0.64 -0.96,0.74, body extent -0.73,-1.05 0.73,1.05, height 0.95
36900000 [mm] "Shielding Cabinet Clip"
  rect 0.6x0.9 smd: 1(-3.05,0) 1(3.05,0)
  rect 1.5x0.9 smd: 1(-1.65,0) 1(1.65,0)
  rect 1.2x0.9 smd: 1(0,0)
  body extent -3.25,-0.41 3.25,0.41, height 1.28